# Altium PCB MB1364.PcbDoc (part 1 of 8)
Units mm, origin at the board's own origin, x right, y up, seen from the top; angles counter-clockwise.
Board outline 70 x 133.34 mm, 6 copper layers (Top Layer, Signal Layer 1, Signal Layer 2, Signal Layer 3, Signal Layer 4, Bottom Layer), stack 1.57 mm thick; 320 components, 286 nets, 1370 pads, 2009 vias.
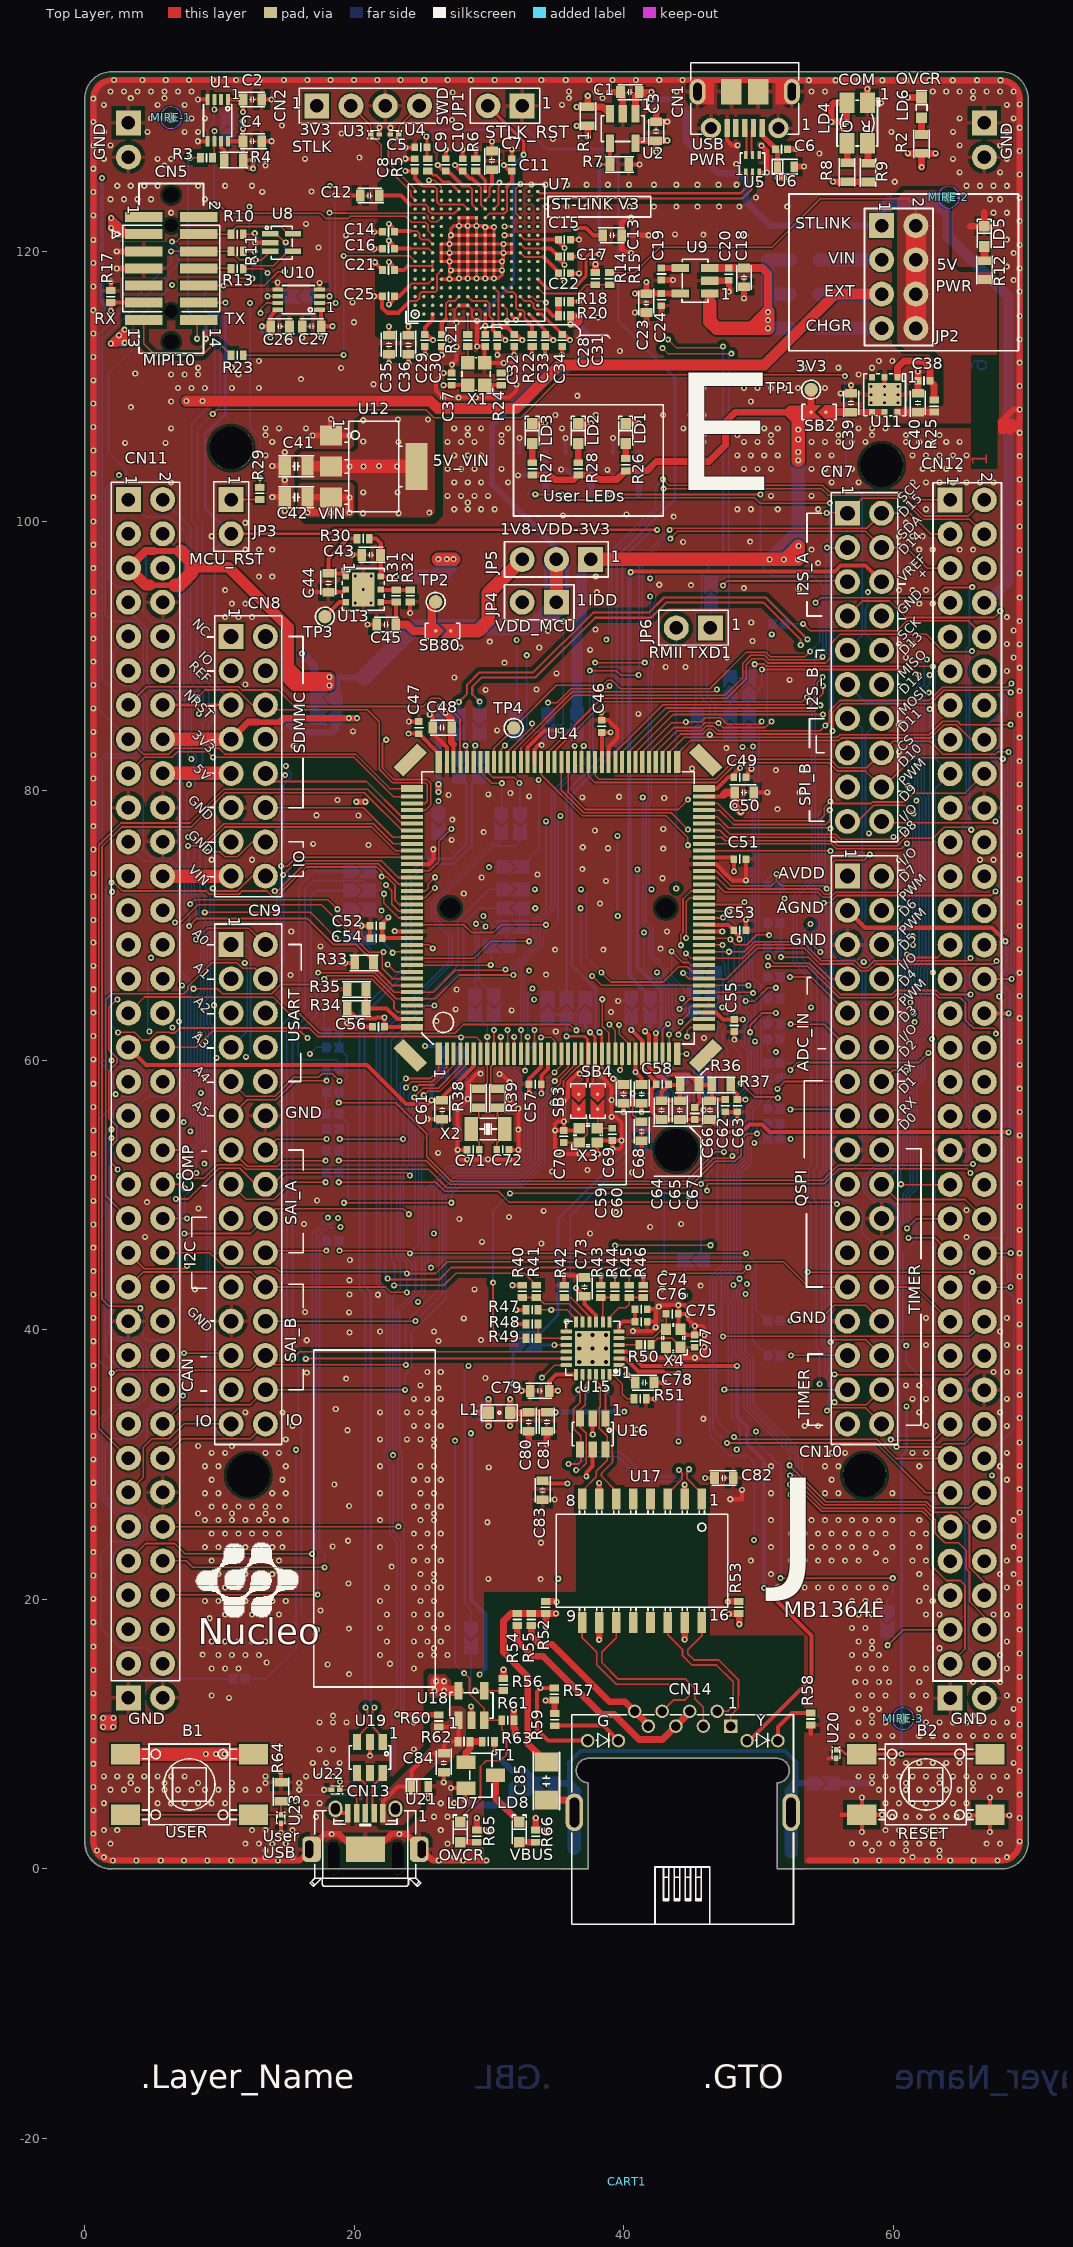
[diagram p0: Top Layer view]
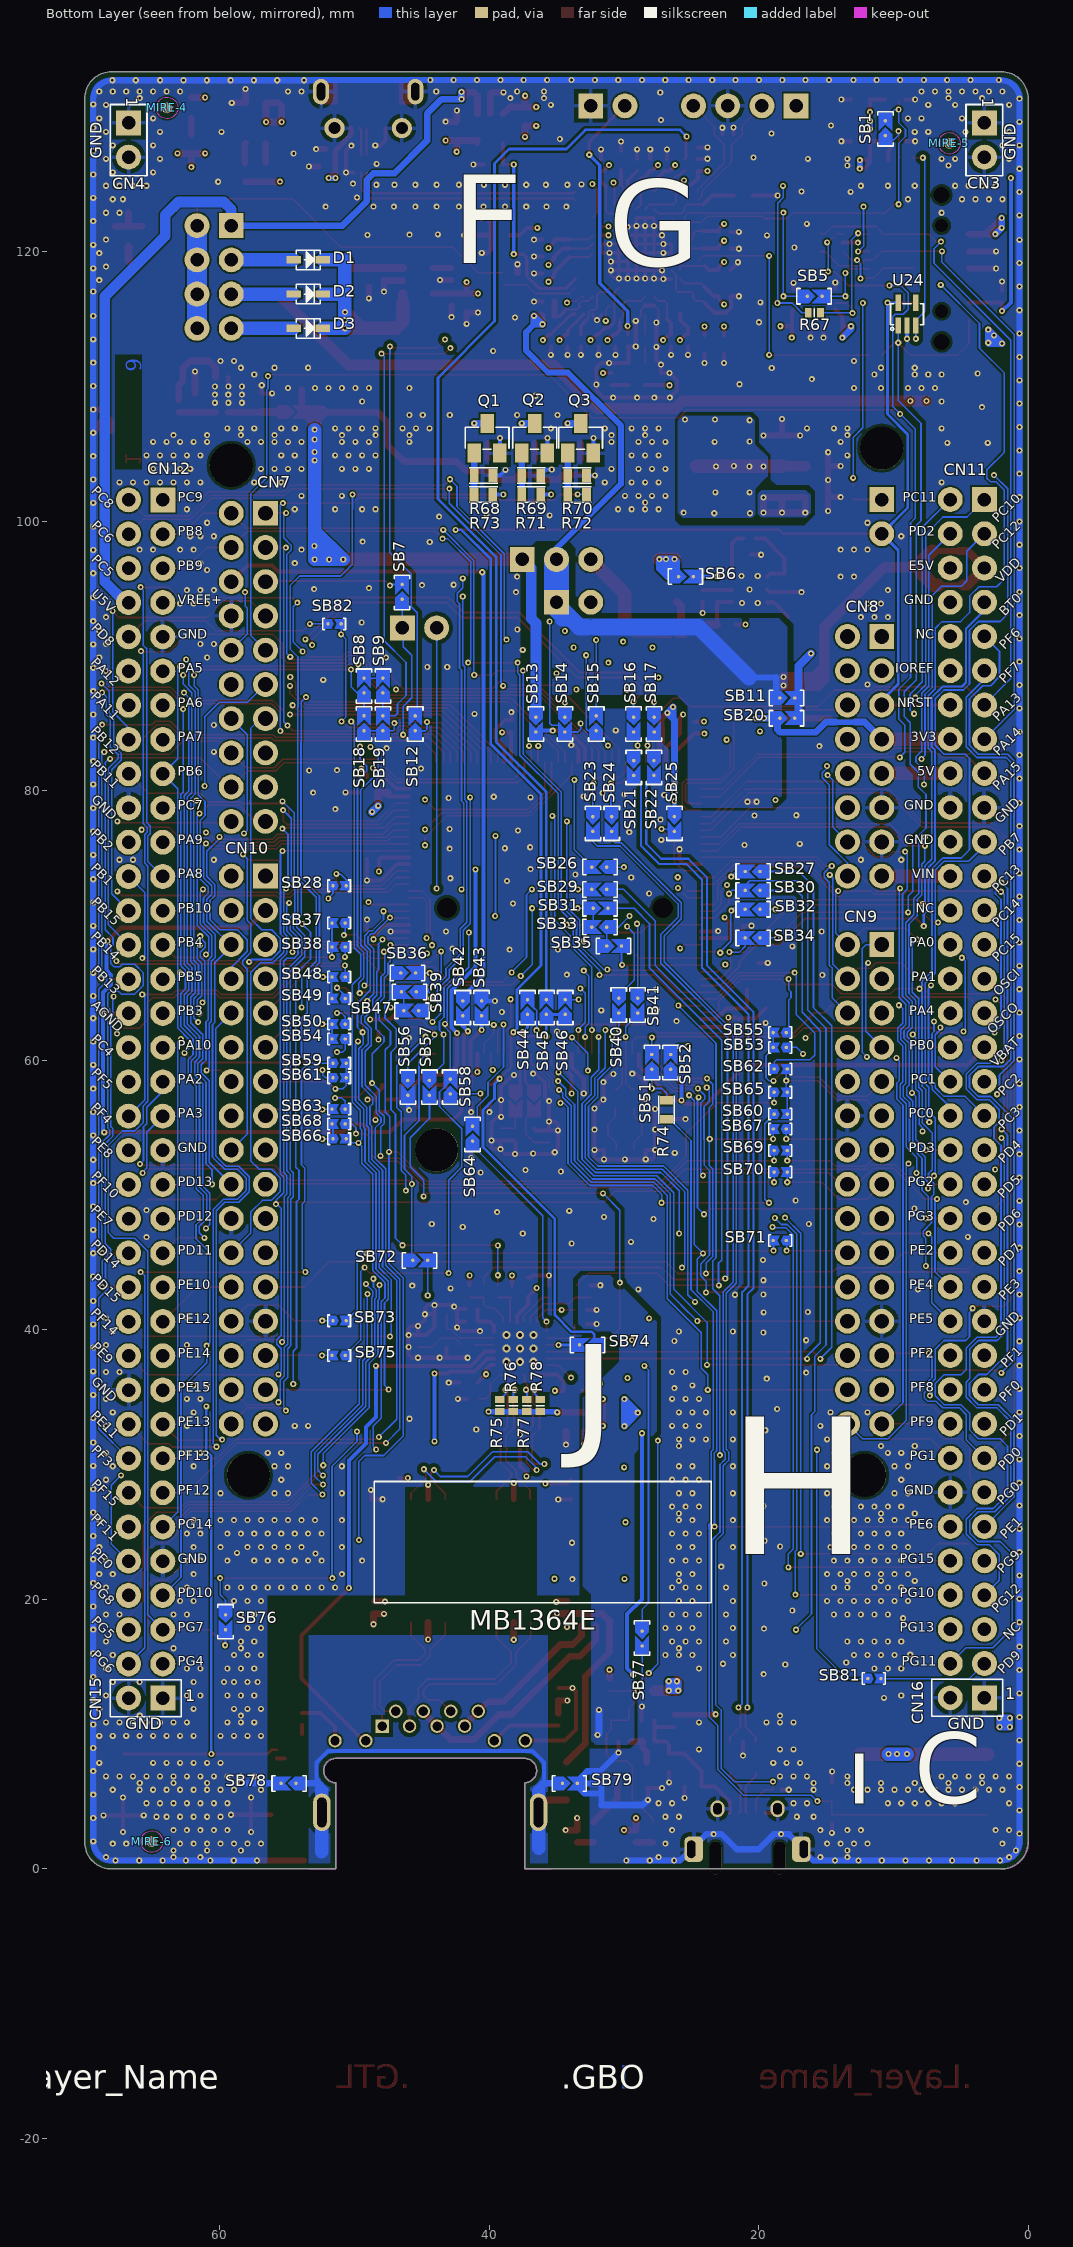
[diagram p1: Bottom Layer view, seen from below]
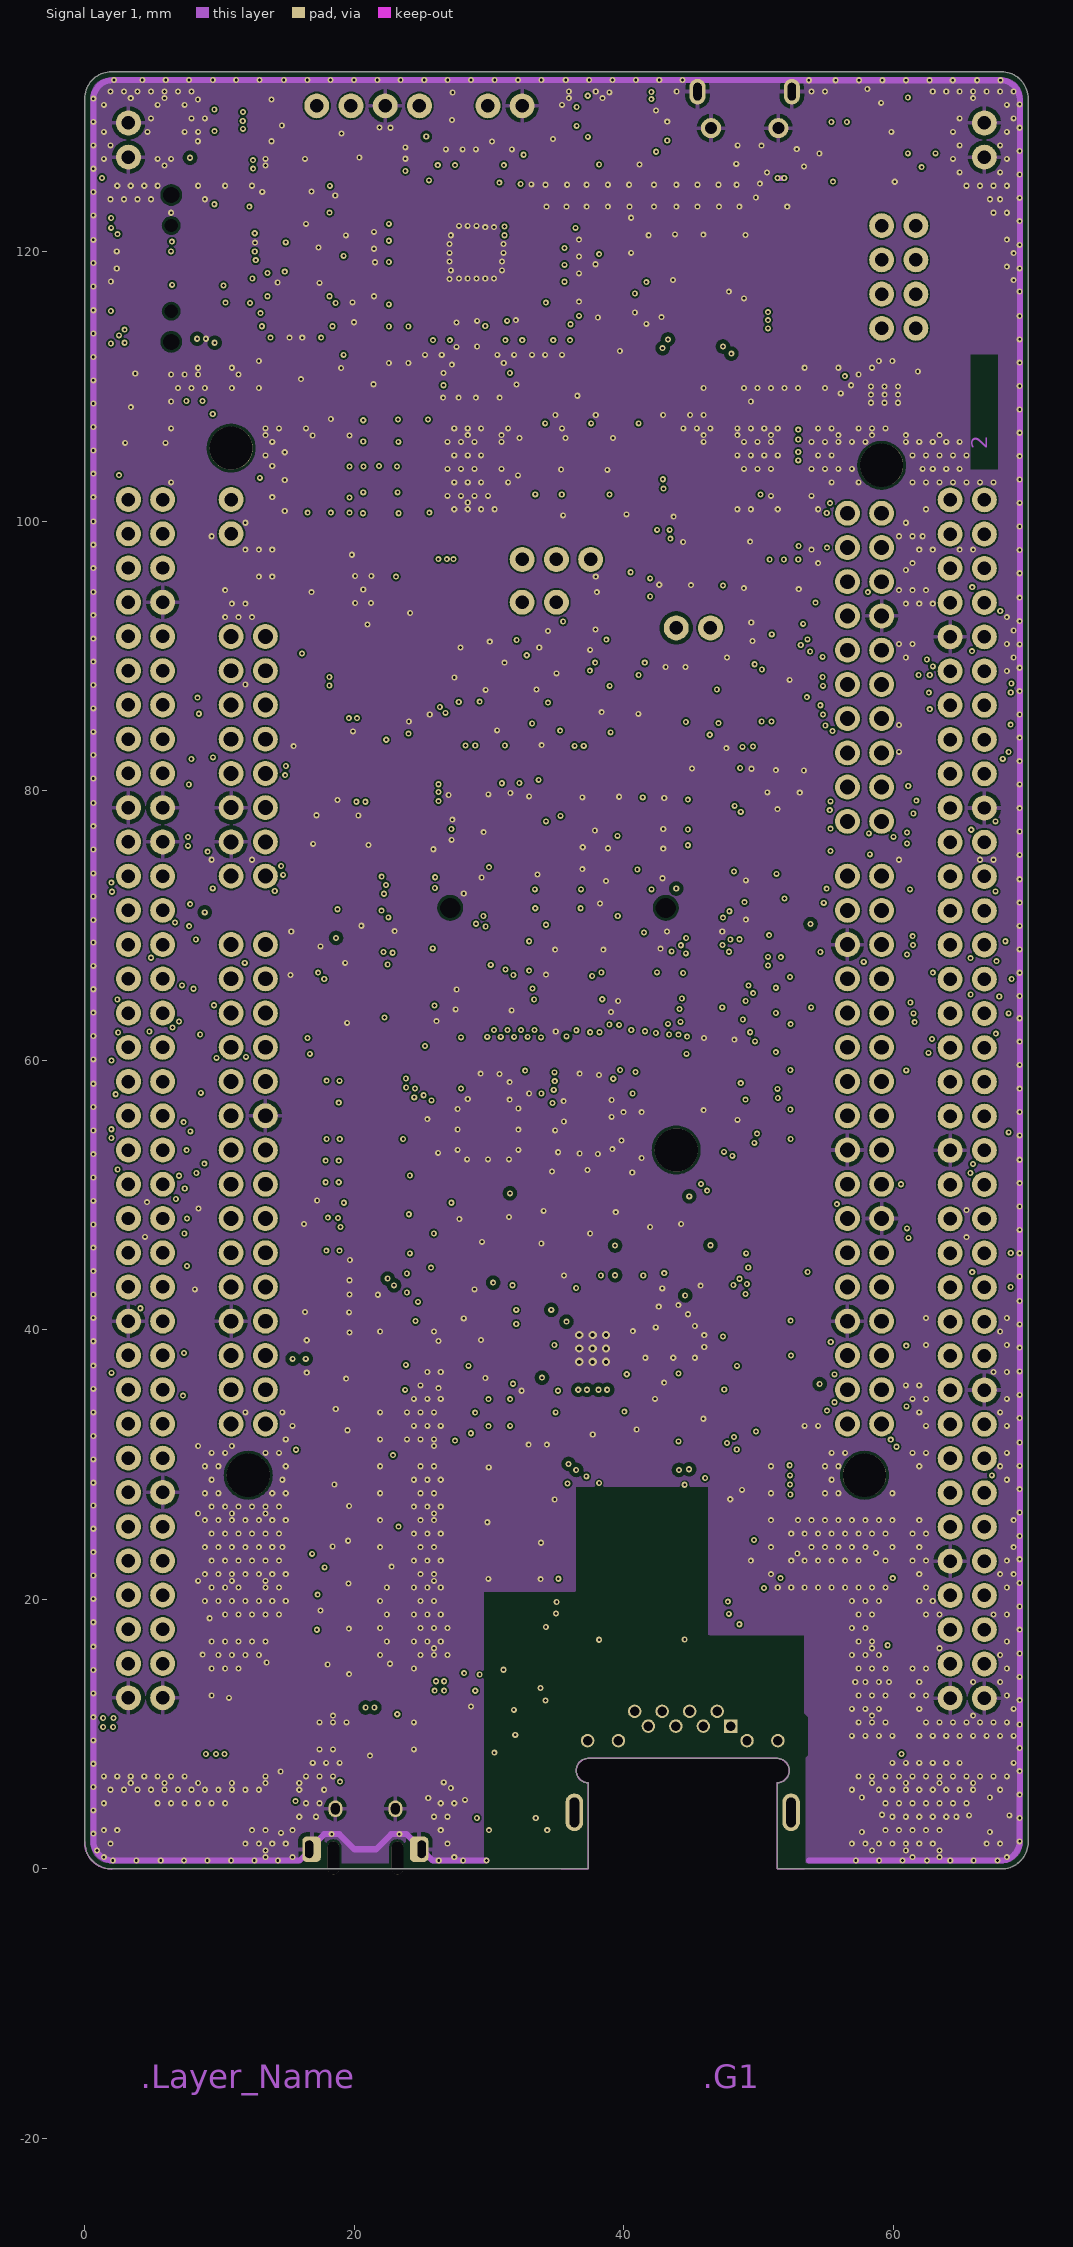
[diagram p2: Signal Layer 1]
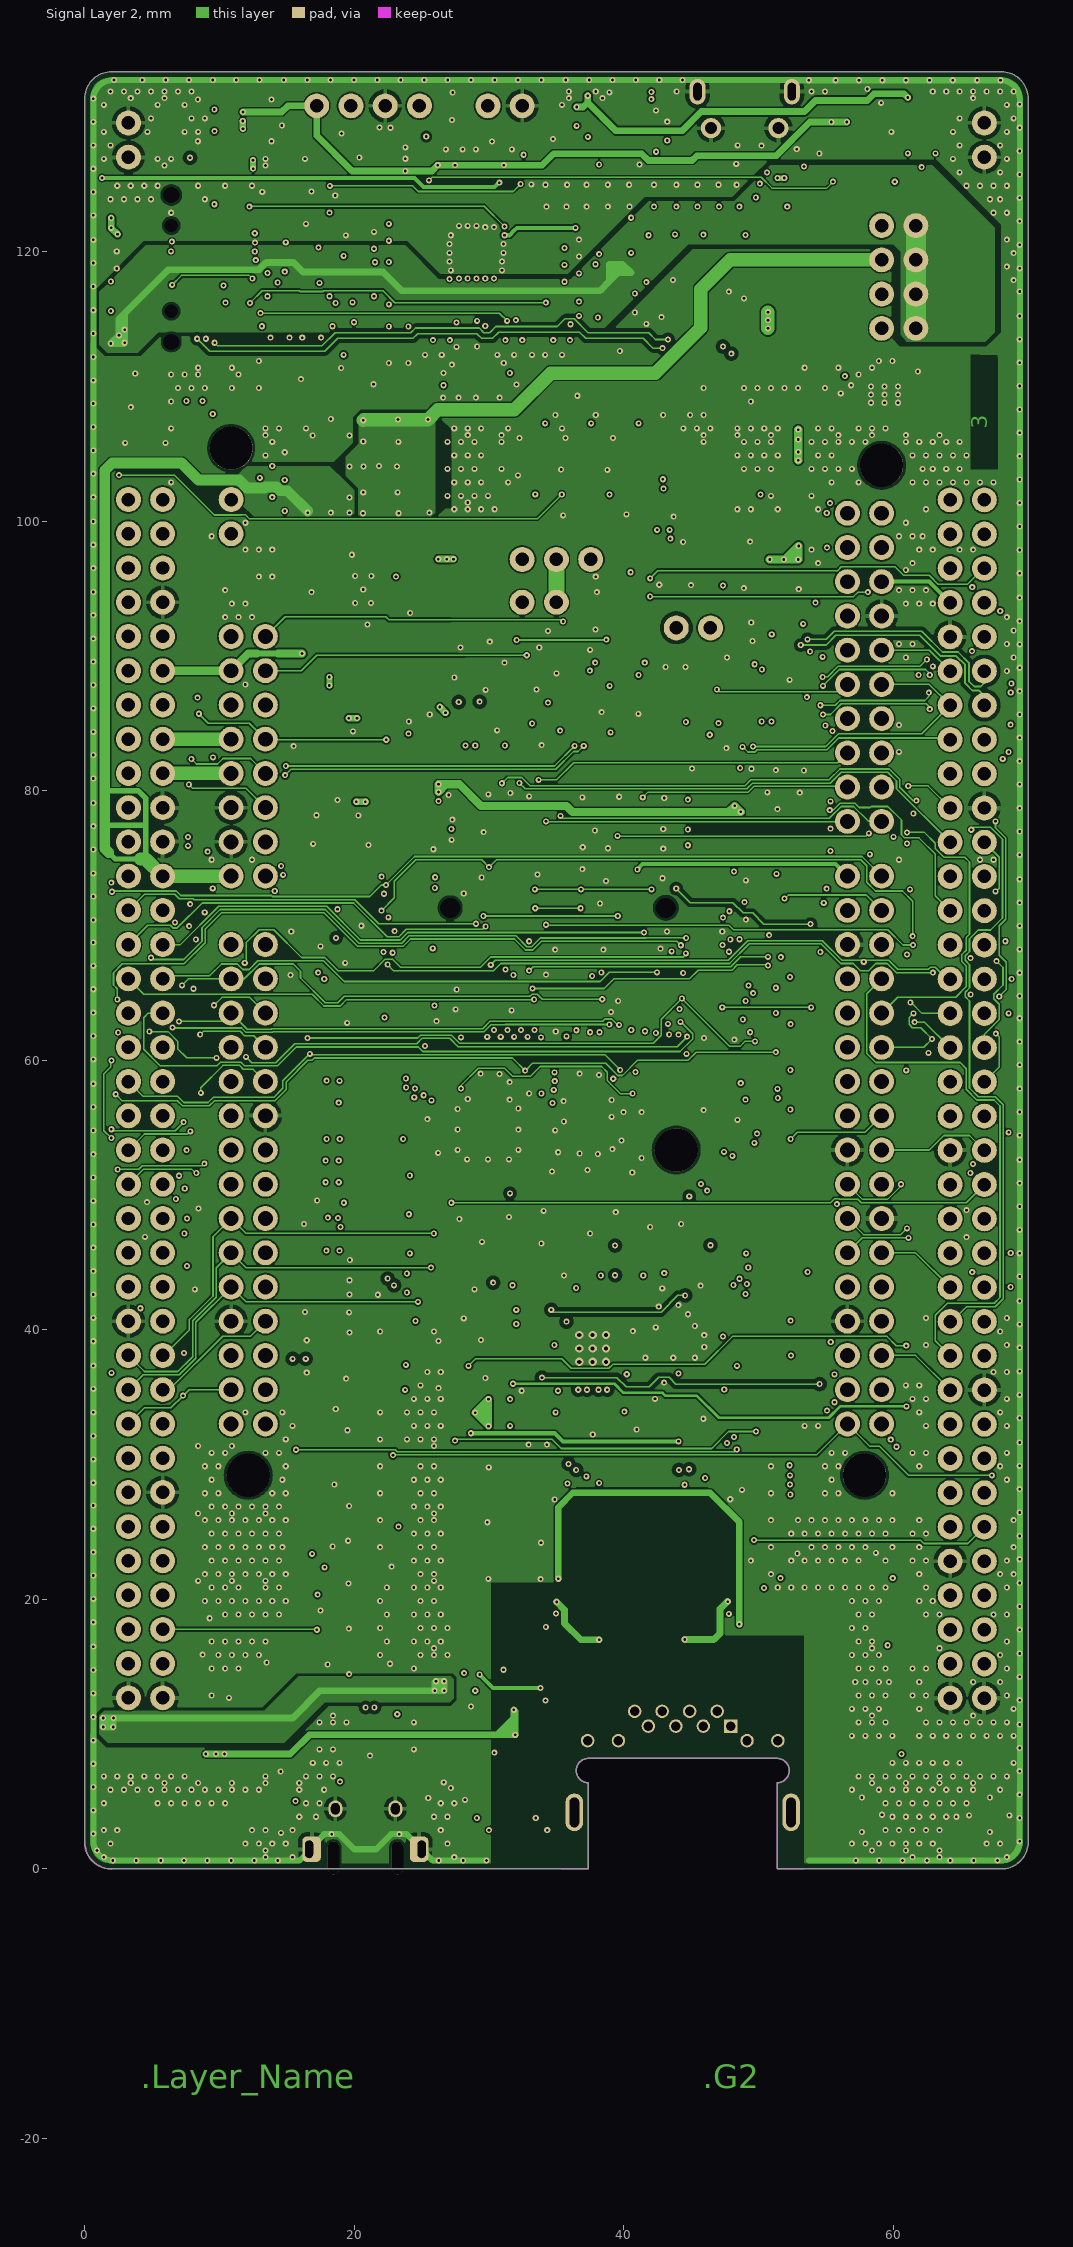
[diagram p3: Signal Layer 2]
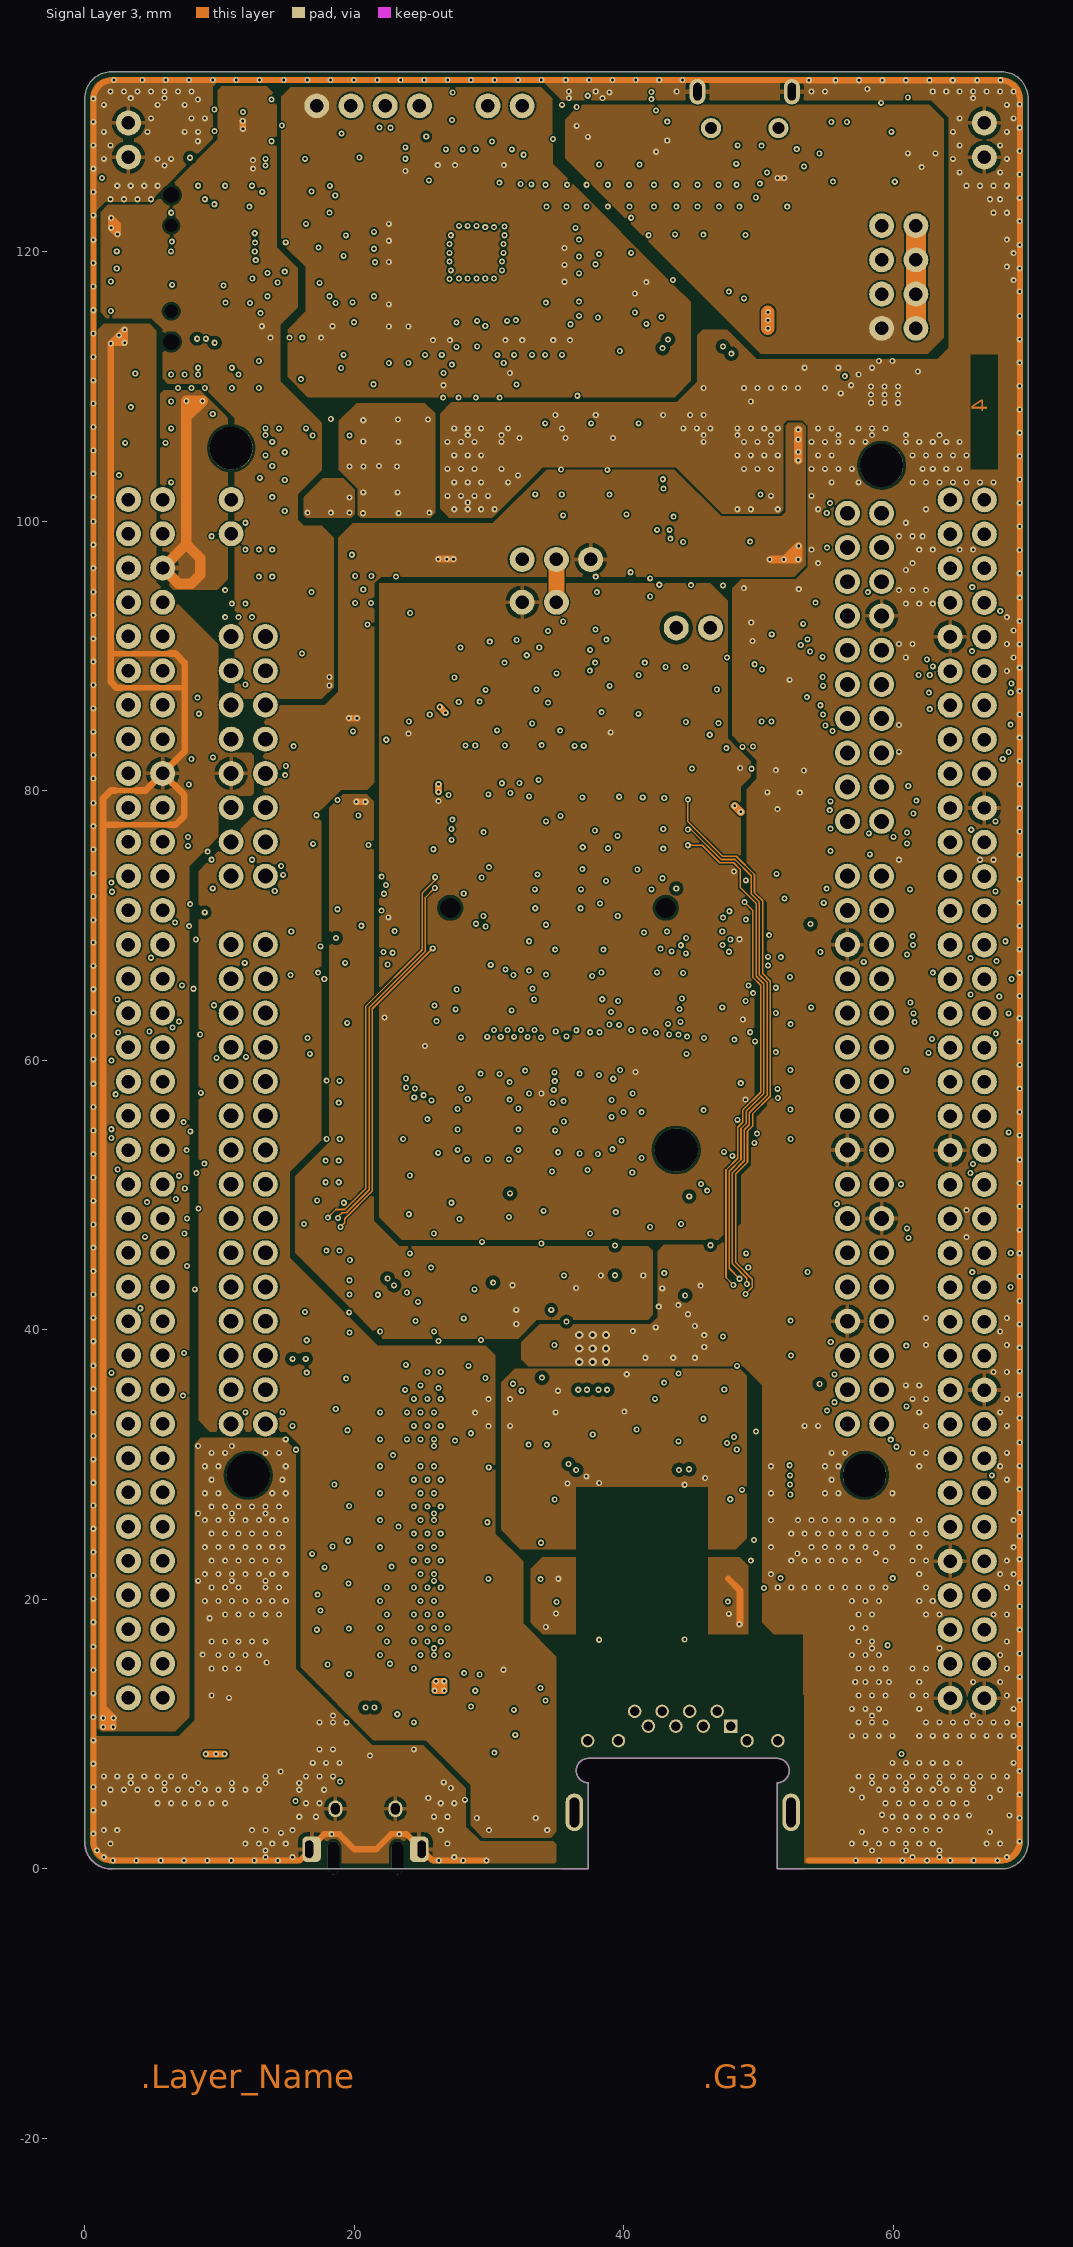
[diagram p4: Signal Layer 3]
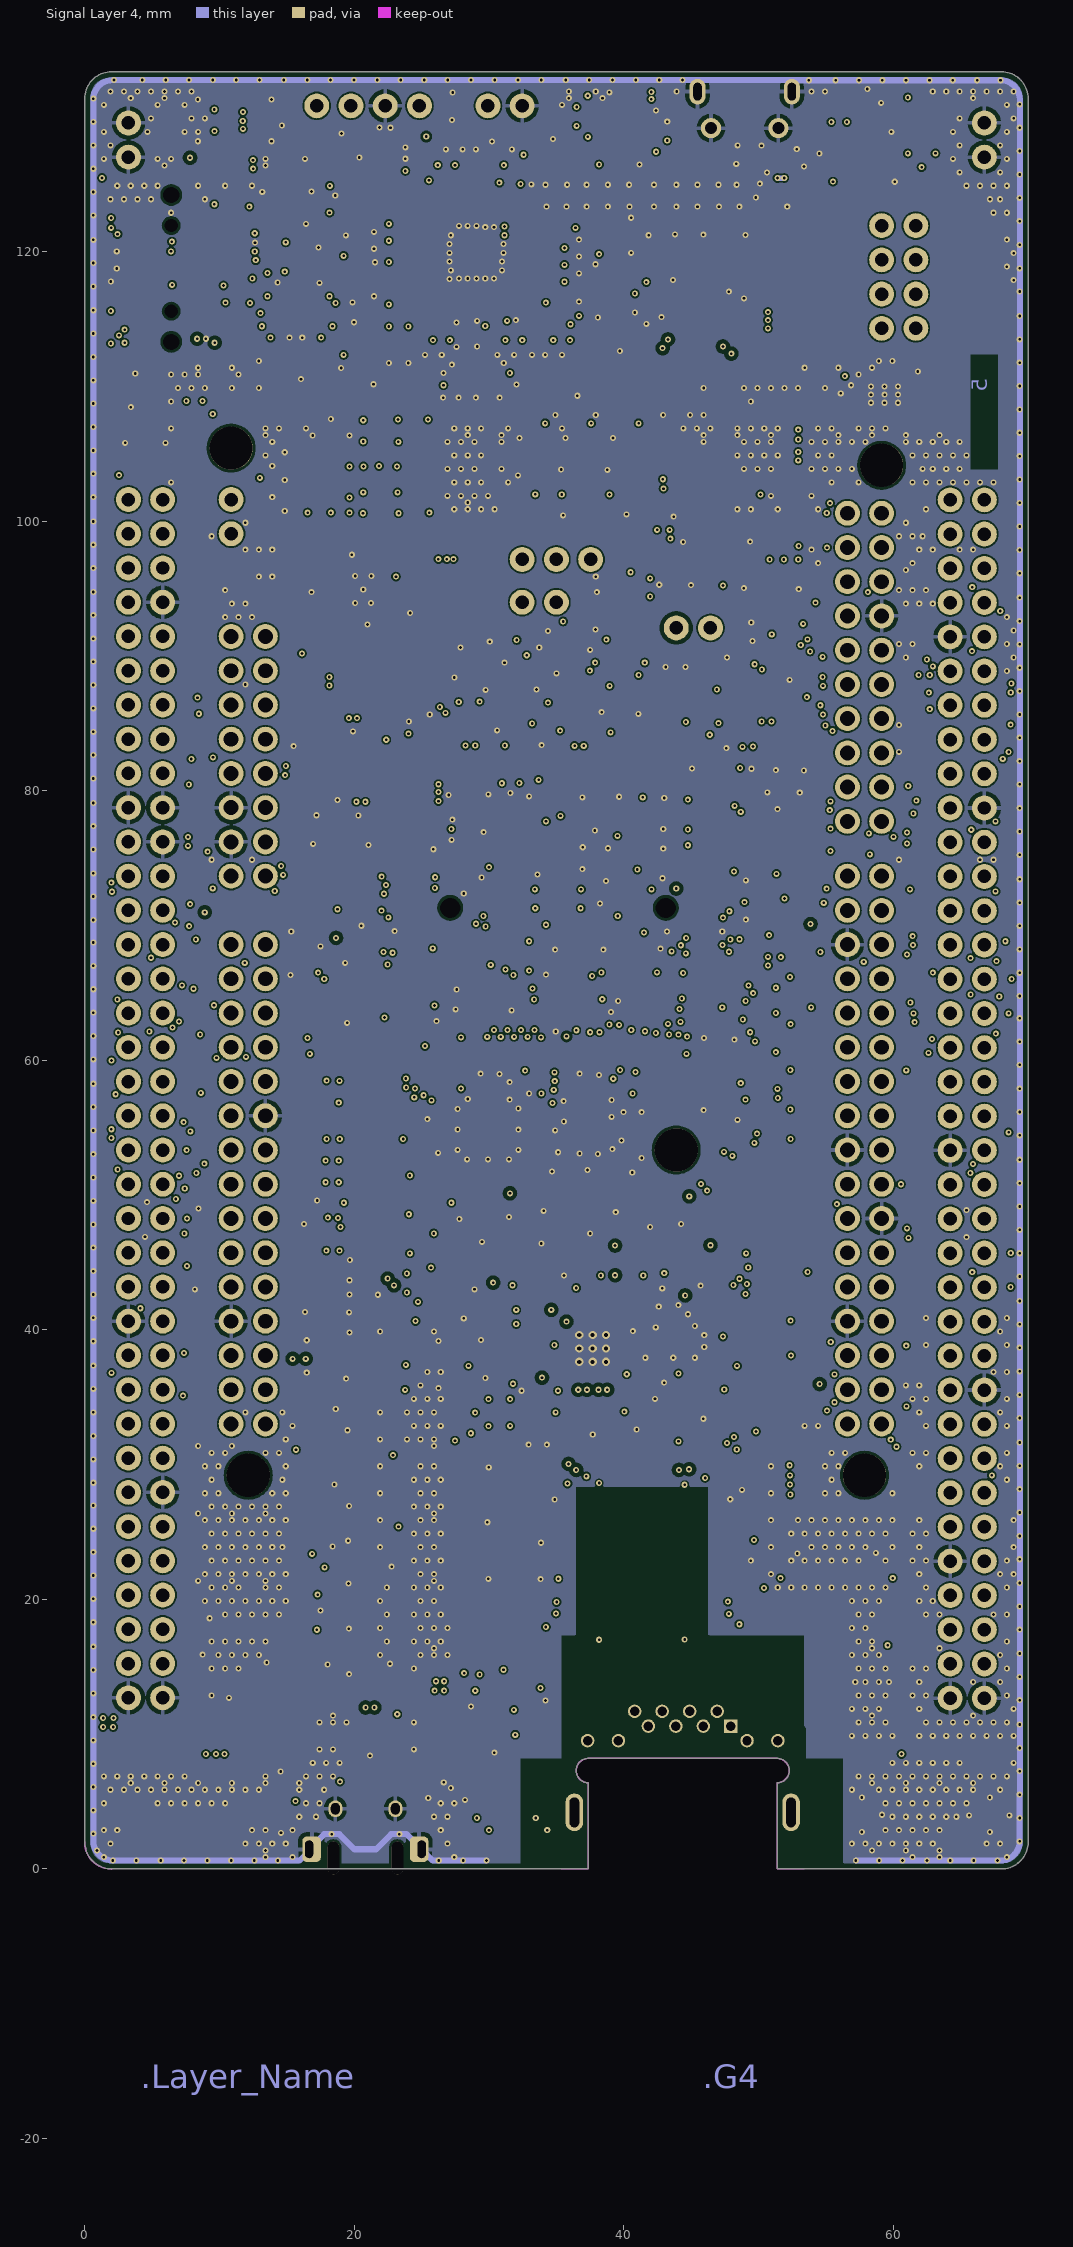
[diagram p5: Signal Layer 4]
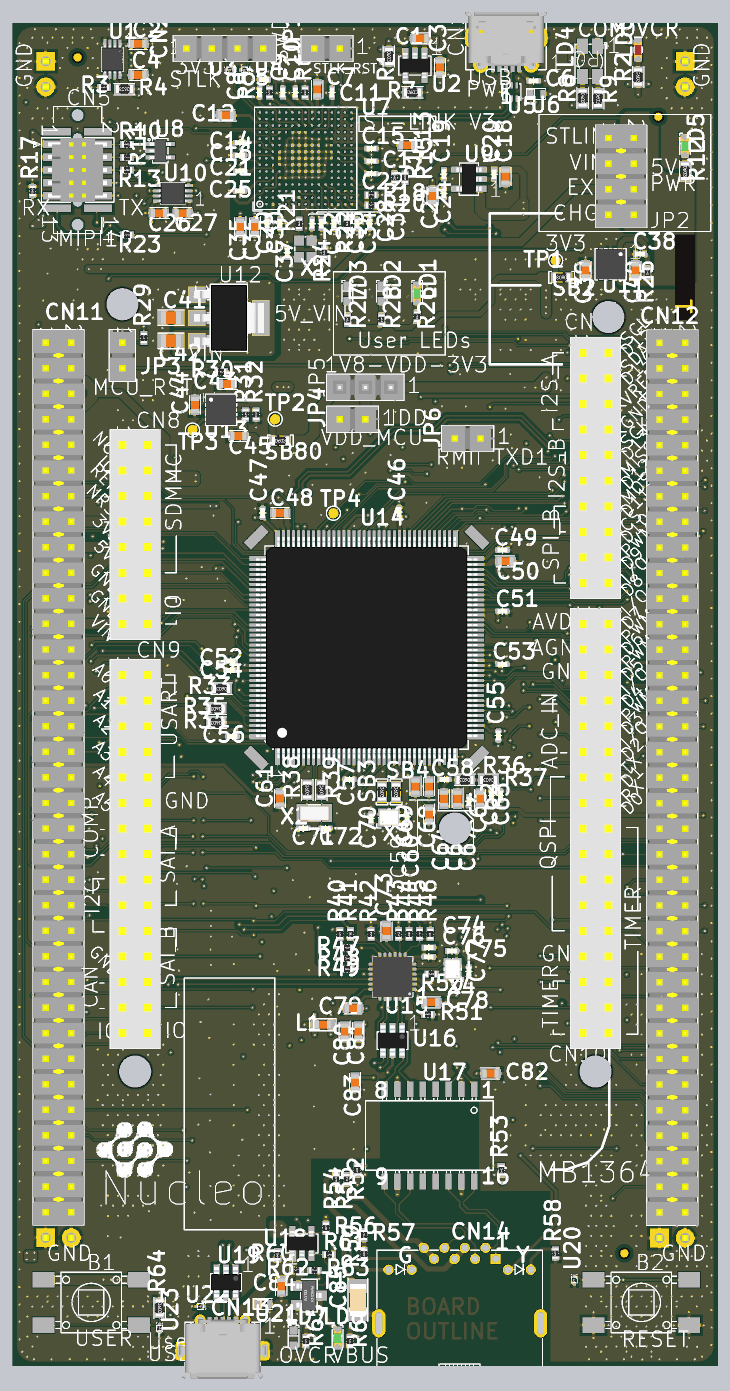
[diagram p12: 3D render of the assembled board from above, using the file's embedded part models]
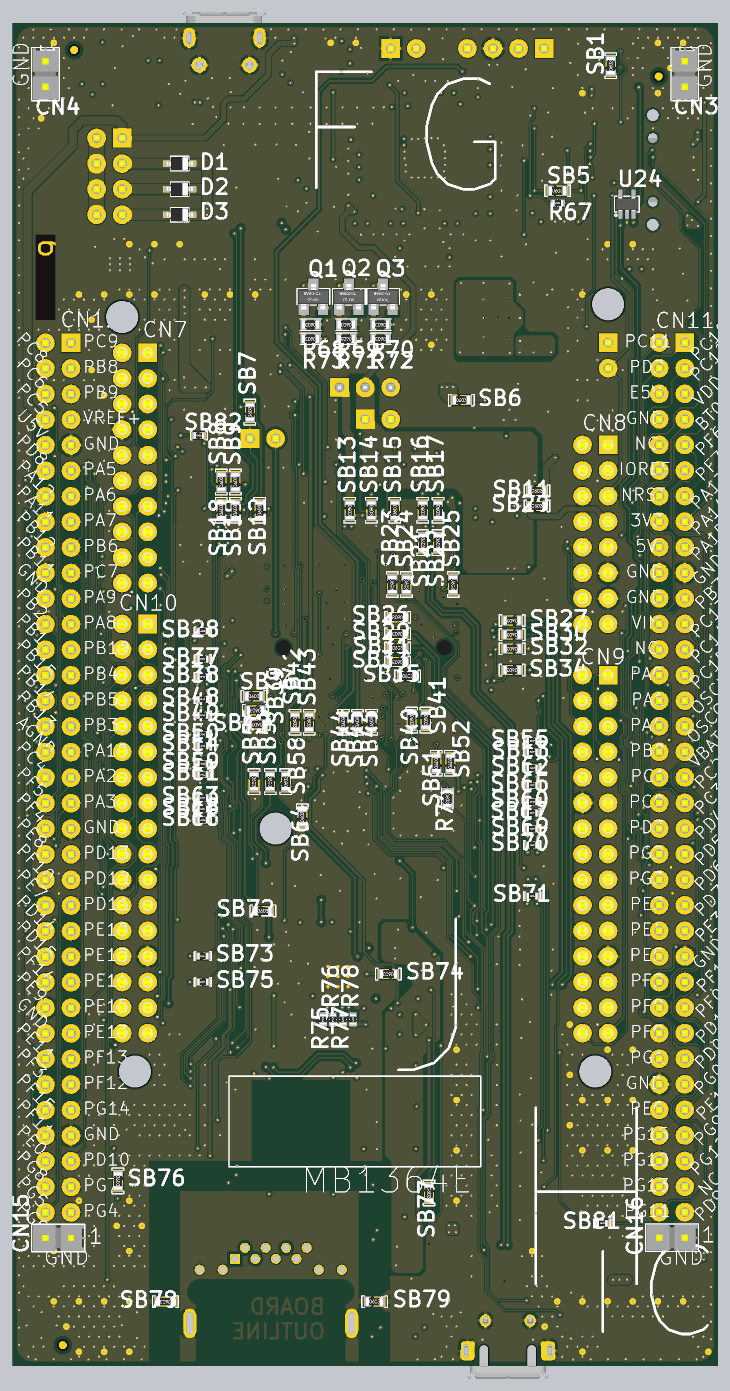
[diagram p13: 3D render of the assembled board from below, using the file's embedded part models]

## Layer stack, top to bottom
Top Solder: solder mask 0.015, Solder Resist, Dk 3.5
Top Layer: signal copper 0.042
Dielectric 1: prepreg 0.0991, FR-4, Dk 4.2
Signal Layer 1: signal copper 0.0348
Dielectric 2: core 0.1016, Dk 4.2
Signal Layer 2: signal copper 0.0348
Dielectric 3: prepreg 0.9457, Dk 4.2
Signal Layer 3: signal copper 0.0348
Dielectric 4: core 0.1016, Dk 4.2
Signal Layer 4: signal copper 0.0348
Dielectric 5: prepreg 0.0991, Dk 4.2
Bottom Layer: signal copper 0.042
Bottom Solder: solder mask 0.015, Solder Resist, Dk 3.5

## Board outline
0,2 ccw(c2,2) 2,0 37.369,0 37.369,6.4 cw(c37.369,7.3) 36.469,7.3 cw(c37.369,7.3) 37.369,8.2 51.369,8.2 cw(c51.369,7.3) 52.269,7.3 cw(c51.369,7.3) 51.369,6.4 51.369,0 68,0 ccw(c68,2) 70,2 70,131.34 ccw(c68,131.34) 68,133.34 2,133.34 ccw(c2,131.34) 0,131.34

## Design rules (kind name [scope] priority, off if disabled: settings)
BoardOutlineClearance [All] p1: gap=0.4 ignorepadtopadclearanceinfootprint=FALSE
Clearance Clearance_RMII_SINGLE_50R [InNetClass('NC_RMII_SINGLE_50R')] p1: gap=0.12 ignorepadtopadclearanceinfootprint=TRUE except(0.2: Arc-Hole Track-Hole SMDPad-SMDPad SMDPad-THPad SMDPad-Hole THPad-THPad THPad-Hole Via-Via Via-Hole Fill-Hole Poly-Hole Region-Hole Text-Hole; 0.3: Arc-Fill Arc-Poly Track-Track Track-Fill Track-Poly SMDPad-Fill SMDPad-Poly THPad-Fill THPad-Poly Via-Fill Via-Poly Fill-Fill Fill-Poly Poly-Poly)
Clearance Clearance_VCP_ISO300 [InNetClass('NC_VCP_ISO300')] p2: gap=0.12 ignorepadtopadclearanceinfootprint=TRUE except(0.2: Arc-Hole Track-Hole SMDPad-SMDPad SMDPad-THPad SMDPad-Hole THPad-THPad THPad-Hole Via-Via Via-Hole Fill-Hole Poly-Hole Region-Hole Text-Hole; 0.3: Arc-Fill Arc-Poly Track-Track Track-Fill Track-Poly SMDPad-Fill SMDPad-Poly THPad-Fill THPad-Poly Via-Fill Via-Poly Fill-Fill Fill-Poly Poly-Poly)
Clearance Clearance_USB_DIFF_90R [InNetClass('NC_USB_DIFF_90R')] p3: gap=0.12 ignorepadtopadclearanceinfootprint=TRUE except(0.2: Arc-Hole Track-Hole SMDPad-SMDPad SMDPad-THPad SMDPad-Hole THPad-THPad THPad-Hole Via-Via Via-Hole Fill-Hole Poly-Hole Region-Hole Text-Hole; 0.3: Arc-Fill Arc-Poly Track-Fill Track-Poly SMDPad-Fill SMDPad-Poly THPad-Fill THPad-Poly Via-Fill Via-Poly Fill-Fill Fill-Poly Poly-Poly)
Clearance Clearance_USB_DIFF_90R_OPTION [InNetClass('NC_USB_DIFF_90R_OPTION') vs OnLayer('Top Layer')] p4: gap=0.12 ignorepadtopadclearanceinfootprint=TRUE except(0.2: Arc-Hole Track-Hole SMDPad-SMDPad SMDPad-THPad SMDPad-Hole THPad-THPad THPad-Hole Via-Via Via-Hole Fill-Hole Poly-Hole Region-Hole Text-Hole; 0.226: Track-Track; 0.3: Arc-Fill Arc-Poly Track-Fill Track-Poly SMDPad-Fill SMDPad-Poly THPad-Fill THPad-Poly Via-Fill Via-Poly Fill-Fill Fill-Poly Poly-Poly)
Clearance Clearance_USB_DIFF_90R_OPTION_L3 [InNetClass('NC_USB_DIFF_90R_OPTION') vs OnLayer('Signal Layer 2')] p5: gap=0.12 ignorepadtopadclearanceinfootprint=TRUE except(0.17: Track-Track; 0.2: Arc-Hole Track-Hole SMDPad-SMDPad SMDPad-THPad SMDPad-Hole THPad-THPad THPad-Hole Via-Via Via-Hole Fill-Hole Poly-Hole Region-Hole Text-Hole; 0.3: Arc-Fill Arc-Poly Track-Fill Track-Poly SMDPad-Fill SMDPad-Poly THPad-Fill THPad-Poly Via-Fill Via-Poly Fill-Fill Fill-Poly Poly-Poly)
Clearance Clearance_RXTX_DIFF_100R [InNetClass('NC_RXTX_DIFF_100R')] p6: gap=0.12 ignorepadtopadclearanceinfootprint=TRUE except(0.2: Arc-Hole Track-Hole SMDPad-SMDPad SMDPad-THPad SMDPad-Hole THPad-THPad THPad-Hole Via-Via Via-Hole Fill-Hole Poly-Hole Region-Hole Text-Hole; 0.3: Arc-Fill Arc-Poly Track-Fill Track-Poly SMDPad-Fill SMDPad-Poly THPad-Fill THPad-Poly Via-Fill Via-Poly Fill-Fill Fill-Poly Poly-Poly)
Clearance Clearance_STLK_ISO200 [InNetClass('NC_STLK_W200-ISO200')] p7: gap=0.12 ignorepadtopadclearanceinfootprint=TRUE except(0.2: Arc-Poly Arc-Hole Track-Track Track-Poly Track-Hole SMDPad-SMDPad SMDPad-THPad SMDPad-Poly SMDPad-Hole THPad-THPad THPad-Poly THPad-Hole Via-Via Via-Poly Via-Hole Fill-Poly Fill-Hole Poly-Poly Poly-Hole Region-Hole Text-Hole; 0.3: Arc-Fill Track-Fill SMDPad-Fill THPad-Fill Via-Fill Fill-Fill)
Clearance [All] p8: gap=0.12 ignorepadtopadclearanceinfootprint=TRUE except(0.2: Arc-Hole Track-Hole SMDPad-SMDPad SMDPad-THPad SMDPad-Hole THPad-THPad THPad-Hole Via-Via Via-Hole Fill-Hole Poly-Hole Region-Hole Text-Hole; 0.3: Arc-Fill Track-Fill SMDPad-Fill THPad-Fill Via-Fill Fill-Fill)
ComponentClearance [All] p1: gap=0 collisioncheckmode=3 verticalgap=0 showdistances=FALSE
DiffPairsRouting DiffPairsRouting_USB_90R [InDifferentialPairClass('DPC_USB_DIFF_90R')] p1: maxlimit=0.252 minlimit=0.226 mostfreqgap=0.226 toplayer_mingap=0.226 toplayer_maxgap=0.226 toplayer_minwidth=0.155 toplayer_maxwidth=0.155 toplayer_prefwidth=0.155 midlayer1_mingap=0.226 midlayer1_maxgap=0.226 midlayer1_minwidth=0.155 midlayer1_maxwidth=0.155 midlayer1_prefwidth=0.155 midlayer2_mingap=0.252 midlayer2_prefgap=0.252 midlayer2_minwidth=0.13 midlayer2_maxwidth=0.13 midlayer2_prefwidth=0.13 midlayer3_maxgap=0.226 midlayer3_prefgap=0.226 midlayer3_minwidth=0.155 midlayer3_maxwidth=0.155 midlayer3_prefwidth=0.155 midlayer4_mingap=0.226 midlayer4_maxgap=0.226 midlayer4_minwidth=0.155 midlayer4_maxwidth=0.155 midlayer4_prefwidth=0.155 bottomlayer_mingap=0.226 bottomlayer_maxgap=0.226 bottomlayer_minwidth=0.155 bottomlayer_maxwidth=0.155 bottomlayer_prefwidth=0.155 maxuncoupledlength=12.7
DiffPairsRouting DiffPairsRouting_RXTX_100R [InDifferentialPairClass('DPC_RXTX_DIFF_100R')] p2: maxlimit=0.277 minlimit=0.252 mostfreqgap=0.277 toplayer_maxgap=0.252 toplayer_prefgap=0.252 toplayer_minwidth=0.11 toplayer_maxwidth=0.13 toplayer_prefwidth=0.13 midlayer1_maxgap=0.252 midlayer1_prefgap=0.252 midlayer1_minwidth=0.13 midlayer1_maxwidth=0.13 midlayer1_prefwidth=0.13 midlayer2_mingap=0.277 midlayer2_minwidth=0.104 midlayer2_maxwidth=0.104 midlayer2_prefwidth=0.104 midlayer3_maxgap=0.252 midlayer3_prefgap=0.252 midlayer3_minwidth=0.13 midlayer3_maxwidth=0.13 midlayer3_prefwidth=0.13 midlayer4_maxgap=0.252 midlayer4_prefgap=0.252 midlayer4_minwidth=0.13 midlayer4_maxwidth=0.13 midlayer4_prefwidth=0.13 bottomlayer_maxgap=0.252 bottomlayer_prefgap=0.252 bottomlayer_minwidth=0.11 bottomlayer_maxwidth=0.13 bottomlayer_prefwidth=0.13 maxuncoupledlength=12.7
FabricationTestPointUsage TestPointUsage [All] p1: valid=0 allowmultiple=FALSE
FabricationTestpoint Testpoint [(IsPad And (OnTopLayer Or OnBottomLayer))] p1: side=3 testpointundercomponent=TRUE minsize=1.016 maxsize=2.54 preferedsize=1.524 minholesize=0 maxholesize=1.016 preferedholesize=0.813 testpointgrid=0.025 allowsidetop=TRUE allowsidebottom=TRUE usegrid=TRUE gridtolerance=0
HoleSize [All] p1: absolutevalues=TRUE maxlimit=3.81 minlimit=0.025 maxpercent=80.000 minpercent=20.000
MaxMinImpedance "Schematic Impedance Constraint_3" [InNet('USB_DEV_HS_P')] p1: minimum=85,00 maximum=95,00
MaxMinImpedance "Schematic Impedance Constraint_2" [InNet('USB_DEV_HS_N')] p2: minimum=85,00 maximum=95,00
MaxMinImpedance "Schematic Impedance Constraint_1" [InNet('USB_DEV_HS_CN_P')] p3: minimum=85,00 maximum=95,00
MaxMinImpedance "Schematic Impedance Constraint" [InNet('USB_DEV_HS_CN_N')] p4: minimum=85,00 maximum=95,00
MinimumSolderMaskSliver [All] p1: minsoldermaskwidth=0
PolygonConnect PolygonConnect_10 [All vs IsNamedPolygon('USB_FS_VBUS_L01_P068')] p1: connectstyle=Direct reliefconductorwidth=0.254 reliefentries=4 polygonreliefangle="90 Angle" airgapwidth=0.254
PolygonConnect PolygonConnect_9 [All vs IsNamedPolygon('5V_L03_P060')] p2: connectstyle=Direct reliefconductorwidth=0.254 reliefentries=4 polygonreliefangle="90 Angle" airgapwidth=0.254
PolygonConnect PolygonConnect_8 [All vs IsNamedPolygon('5V_L01_P058')] p3: connectstyle=Direct reliefconductorwidth=0.254 reliefentries=4 polygonreliefangle="90 Angle" airgapwidth=0.254
PolygonConnect PolygonConnect_7 [All vs IsNamedPolygon('3V3_STLK_L04_P042')] p4: connectstyle=Direct reliefconductorwidth=0.254 reliefentries=4 polygonreliefangle="90 Angle" airgapwidth=0.254
PolygonConnect PolygonConnect_6 [All vs IsNamedPolygon('5V_USB_CHGR_L04_P040')] p5: connectstyle=Direct reliefconductorwidth=0.254 reliefentries=4 polygonreliefangle="90 Angle" airgapwidth=0.254
PolygonConnect PolygonConnect_5 [All vs IsNamedPolygon('5V_L01_P038')] p6: connectstyle=Direct reliefconductorwidth=0.254 reliefentries=4 polygonreliefangle="90 Angle" airgapwidth=0.254
PolygonConnect PolygonConnect_4 [All vs IsNamedPolygon('5V_L01_P038')] p7: thpad.connectstyle=Relief thpad.reliefconductorwidth=0.4 thpad.reliefentries=4 thpad.polygonreliefangle="90 Angle" thpad.airgapwidth=0.4 smdpad.connectstyle=Direct smdpad.reliefconductorwidth=0.254 smdpad.reliefentries=4 smdpad.polygonreliefangle="90 Angle" smdpad.airgapwidth=0.254 via.connectstyle=Direct via.reliefconductorwidth=0.254 via.reliefentries=4 via.polygonreliefangle="90 Angle" via.airgapwidth=0.254
PolygonConnect PolygonConnect_3 [All vs IsNamedPolygon('5V_VIN_L01_P028')] p8: connectstyle=Direct reliefconductorwidth=0.254 reliefentries=4 polygonreliefangle="90 Angle" airgapwidth=0.254
PolygonConnect PolygonConnect_2 [All vs IsNamedPolygon('VIN_L01_P026')] p9: connectstyle=Direct reliefconductorwidth=0.254 reliefentries=4 polygonreliefangle="90 Angle" airgapwidth=0.254
PolygonConnect PolygonConnect_1 [All vs IsNamedPolygon('GND_L01_P024')] p10: connectstyle=Direct reliefconductorwidth=0.254 reliefentries=4 polygonreliefangle="90 Angle" airgapwidth=0.254
PolygonConnect [All] p11: thpad.connectstyle=Relief thpad.reliefconductorwidth=0.3 thpad.reliefentries=4 thpad.polygonreliefangle="90 Angle" thpad.airgapwidth=0.3 smdpad.connectstyle=Relief smdpad.reliefconductorwidth=0.3 smdpad.reliefentries=4 smdpad.polygonreliefangle="90 Angle" smdpad.airgapwidth=0.3 via.connectstyle=Direct via.reliefconductorwidth=0.254 via.reliefentries=4 via.polygonreliefangle="90 Angle" via.airgapwidth=0.254
RoutingLayers RoutingLayers_USB_DIFF_90R [InDifferentialPairClass('DPC_USB_DIFF_90R')] p1: top layer_v5=TRUE mid layer 1_v5=TRUE mid layer 2_v5=TRUE mid layer 3_v5=TRUE mid layer 4_v5=TRUE bottom layer_v5=TRUE
RoutingLayers RoutingLayers_RXTX_DIFF_100R [InDifferentialPairClass('DPC_RXTX_DIFF_100R')] p2: top layer_v5=TRUE mid layer 1_v5=TRUE mid layer 2_v5=TRUE mid layer 3_v5=TRUE mid layer 4_v5=TRUE bottom layer_v5=TRUE
RoutingLayers RoutingLayers_RMII_SINGLE_50R [InNetClass('NC_RMII_SINGLE_50R')] p3: top layer_v5=TRUE mid layer 1_v5=TRUE mid layer 2_v5=TRUE mid layer 3_v5=TRUE mid layer 4_v5=TRUE bottom layer_v5=TRUE
RoutingVias RoutingVias_Default [All] p1: holewidth=0.2 width=0.45 viastyle="Through Hole" minholewidth=0.2 minwidth=0.45 maxholewidth=0.2 maxwidth=0.45
SilkToSilkClearance [All] p1: silktosilkclearance=0.102
SilkToSolderMaskClearance SilkscreenOverComponentPads [IsPad] p1: minsilkscreentomaskgap=0.102 clearancetoexposedcopper=TRUE
SolderMaskExpansion [All] p1: expansion=0.102
Width Width_RMII_SINGLE_50R [InNetClass('NC_RMII_SINGLE_50R')] p1: maxlimit=0.127 minlimit=0.102 preferedwidth=0.127 toplayer_minwidth=0.127 midlayer1_minwidth=0.127 midlayer2_maxwidth=0.102 midlayer2_prefwidth=0.102 midlayer3_minwidth=0.127 midlayer4_minwidth=0.127 bottomlayer_minwidth=0.127 minimp=50.000000 maximp=50.000000 favimp=50.000000
Width Width_POWER_300u [InNetClass('NC_POWER_300u')] p2: maxlimit=10 minlimit=0.12 preferedwidth=0.3 minimp=50.000000 maximp=50.000000 favimp=50.000000
Width Width_GROUND [InNetClass('NC_GROUND')] p3: maxlimit=10 minlimit=0.12 preferedwidth=0.3 minimp=50.000000 maximp=50.000000 favimp=50.000000
Width Width_POWER_500u [InNetClass('NC_POWER_500u')] p4: maxlimit=10 minlimit=0.12 preferedwidth=0.5 minimp=50.000000 maximp=50.000000 favimp=50.000000
Width Width_POWER_SMPS [InNetClass('NC_POWER_SMPS')] p5: maxlimit=10 minlimit=0.12 preferedwidth=0.5 minimp=50.000000 maximp=50.000000 favimp=50.000000
Width Width_STLK_W200 [InNetClass('NC_STLK_W200-ISO200')] p6: maxlimit=10 minlimit=0.2 preferedwidth=0.2 minimp=50.000000 maximp=50.000000 favimp=50.000000
Width Width_USB_OPTION [InNetClass('NC_USB_DIFF_90R_OPTION')] p7: maxlimit=0.155 minlimit=0.13 preferedwidth=0.155 toplayer_minwidth=0.155 midlayer1_minwidth=0.155 midlayer2_maxwidth=0.13 midlayer2_prefwidth=0.13 midlayer3_minwidth=0.155 midlayer4_minwidth=0.155 bottomlayer_minwidth=0.155 minimp=50.000000 maximp=50.000000 favimp=50.000000
Width Width_RD_N [InNet('RD_N')] p8: maxlimit=10 minlimit=0.11 preferedwidth=0.12 toplayer_maxwidth=0.11 toplayer_prefwidth=0.11 midlayer1_minwidth=0.12 midlayer2_minwidth=0.12 midlayer3_minwidth=0.12 midlayer4_minwidth=0.12 bottomlayer_maxwidth=0.11 bottomlayer_prefwidth=0.11 minimp=50.000000 maximp=50.000000 favimp=50.000000
Width Width_TD_P [InNet('TD_P')] p9: maxlimit=10 minlimit=0.11 preferedwidth=0.12 toplayer_maxwidth=0.11 toplayer_prefwidth=0.11 midlayer1_minwidth=0.12 midlayer2_minwidth=0.12 midlayer3_minwidth=0.12 midlayer4_minwidth=0.12 bottomlayer_maxwidth=0.11 bottomlayer_prefwidth=0.11 minimp=50.000000 maximp=50.000000 favimp=50.000000
Width [All] p10: maxlimit=10 minlimit=0.12 preferedwidth=0.12 minimp=50.000000 maximp=50.000000 favimp=50.000000
21 further rules are at their usual default settings.

## Classes and differential pairs
net class NC_POWER_500u: 1V8 3V3 3V3_STLK 5V 5V_EXT 5V_USB_CHGR 5V_USB_STLK 5V_VIN IOREF USB_FS_VBUS VDD VIN
net class NC_POWER_SMPS: VCAP VDD_MCU
net class NC_POWER_300u: VBAT VDDA VREFP
net class NC_GROUND: AGND GND
net class NC_RXTX_DIFF_100R: RD_N RD_P RX_N RX_P TD_N TD_P TX_N TX_P
differential pair class DPC_USB_DIFF_90R: USB_DEV_HS USB_DEV_HS_CN USB_FS USB_FS_CN
differential pair class DPC_RXTX_DIFF_100R: RD RX TD TX
net class NC_USB_DIFF_90R: NetCN13_2 NetCN13_3 USB_DEV_HS_CN_N USB_DEV_HS_CN_P USB_DEV_HS_N USB_DEV_HS_P USB_FS_N USB_FS_P
net class NC_RMII_SINGLE_50R: RMII_CRS_DV RMII_MDC RMII_MDIO RMII_REF_CLK RMII_RXD0 RMII_RXD1 RMII_TX_EN RMII_TXD0 RMII_TXD1
net class NC_VCP_ISO300: T_VCP_RX T_VCP_TX
net class NC_STLK_W200-ISO200: NetR5_1 PH0-OSC_IN STLK_MCO
net class NC_USB_DIFF_90R_OPTION: NetCN12_12 NetCN12_14
differential pair USB_FS: +USB_FS_P -USB_FS_N
differential pair USB_DEV_HS: +USB_DEV_HS_P -USB_DEV_HS_N
differential pair USB_DEV_HS_CN: +USB_DEV_HS_CN_P -USB_DEV_HS_CN_N
differential pair TX: +TX_P -TX_N
differential pair TD: +TD_P -TD_N
differential pair RX: +RX_P -RX_N
differential pair RD: +RD_P -RD_N
differential pair USB_FS_CN: +NetCN13_3 -NetCN13_2

## Components (designator, comment, footprint, x,y, rotation, side; value= is the part's Value field where it differs from the comment)
B1 "SW-PUSH-CMS" SWI_WEALTHMETAL_TD-0341_4P_BLUE 7.767,6.273 r270 top locked value=SWITCH
B2 "SW-PUSH-CMS" SWI_WEALTHMETAL_TD-0341_4P_BLACK 62.403,6.273 r270 top locked value=SWITCH
C1 "Capacitor" C0603 40.448,131.82 r0 top value=1uF
C2 "Capacitor" C0603 12.441,131.279 r180 top value=100nF
C3 "Capacitor" C0603 42.396,128.927 r270 top value=1uF
C4 "Capacitor" C0603 12.441,128.179 r0 top value=100nF
C5 "Capacitor" C0402 24.941,127.729 r0 top value=20pF
C6 "Capacitor" C0402 51.699,127.593 r180 top value=100pF
C7 "Capacitor" C0603 30.216,126.754 r270 top value=2.2uF
C8 "Capacitor" C0402 24.491,126.429 r270 top value=100nF
C9 "Capacitor" C0402 26.791,126.429 r270 top value=100nF
C10 "Capacitor" C0402 28.041,126.429 r270 top value=100nF
C11 "Capacitor" C0402 31.691,126.429 r270 top value=100nF
C12 "Capacitor" C0603 21.141,124.154 r0 top value=2.2uF
C13 "Capacitor" C0603 39.141,121.204 r180 top value=2.2uF
C14 "Capacitor" C0402 22.541,121.454 r0 top value=100nF
C15 "Capacitor" C0402 35.591,120.879 r180 top value=100nF
C16 "Capacitor" C0402 22.541,120.204 r0 top value=100nF
C17 "Capacitor" C0402 35.591,119.629 r180 top value=100nF
C18 "Capacitor" C0603 48.916,118.079 r270 top value=1uF
C19 "Capacitor" C0402 42.791,118.329 r90 top value=10nF
C20 "Capacitor" C0402 47.794,118.32 r90 top value=100nF
C21 "Capacitor" C0402 22.541,118.629 r0 top value=100nF
C22 "Capacitor" C0402 35.591,118.379 r180 top value=100nF
C23 "Capacitor" C0603 41.666,116.179 r90 top value=1uF
C24 "Capacitor" C0402 42.791,116.429 r90 top value=100nF
C25 "Capacitor" C0402 22.541,116.679 r0 top value=100nF
C26 "Capacitor" C0603 14.491,114.454 r0 top value=100nF
C27 "Capacitor" C0603 16.841,114.454 r0 top value=100nF
C28 "Capacitor" C0402 29.716,113.404 r90 top value=100nF
C29 "Capacitor" C0402 25.241,113.404 r90 top value=100nF
C30 "Capacitor" C0402 26.491,113.404 r90 top value=100nF
C31 "Capacitor" C0402 30.616,113.404 r90 top value=100nF
C32 "Capacitor" C0402 31.866,113.404 r90 top value=100nF
C33 "Capacitor" C0402 34.166,113.404 r90 top value=100nF
C34 "Capacitor" C0402 35.416,113.404 r90 top value=100nF
C35 "Capacitor" C0603 22.566,113.079 r90 top value=4.7uF
C36 "Capacitor" C0603 24.016,113.079 r90 top value=1uF
C37 "Capacitor" C0402 27.241,110.529 r270 top value=100nF
C38 "Capacitor" C0402 62.266,110.404 r180 top value=100nF
C39 "Capacitor" C0603 56.866,108.779 r270 top value=4.7uF
C40 "Capacitor" C0603 61.816,108.779 r270 top value=4.7uF
C41 "Capacitor" C0805 15.691,104.074 r0 top value=10uF
C42 "Capacitor" C0805 15.691,101.774 r0 top value=10uF
C43 "Capacitor" C0603 21.25,97.5 r0 top value=4.7uF
C44 "Capacitor" C0603 18.075,95.425 r90 top value=100nF
C45 "Capacitor" C0603 22.375,92.325 r0 top value=4.7uF
C46 "Capacitor" C0402 38.35,84.775 r270 top value=100nF
C47 "Capacitor" C0402 24.8,84.675 r270 top value=100nF
C48 "Capacitor" C0603 26.525,84.675 r0 top value=2.2uF
C49 "Capacitor" C0402 48.6,81 r180 top value=100nF
C50 "Capacitor" C0603 48.925,79.875 r180 top value=2.2uF
C51 "Capacitor" C0402 48.6,74.925 r180 top value=100nF
C52 "Capacitor" C0402 21.625,69.975 r0 top value=100nF
C53 "Capacitor" C0402 48.6,69.65 r180 top value=100nF
C54 "Capacitor" C0402 21.625,69.05 r0 top value=100nF
C55 "Capacitor" C0402 48.2,62.575 r90 top value=100nF
C56 "Capacitor" C0402 21.8,62.475 r0 top value=100nF
C57 "Capacitor" C0402 33.425,58.225 r0 top value=100nF
C58 "Capacitor" C0402 42.85,58.225 r0 top value=100nF
C59 "Capacitor" C0603 39.975,57.5 r90 top value=100nF
C60 "Capacitor" C0603 41.325,57.5 r90 top value=4.7uF
C61 "Capacitor" C0603 26.525,56.325 r90 top value=1uF
C62 "Capacitor" C0402 47.525,56.625 r270 top value=100nF
C63 "Capacitor" C0402 48.425,56.625 r270 top value=100nF
C64 "Capacitor" C0603 42.8,56.3 r270 top value=1uF
C65 "Capacitor" C0603 44.15,56.3 r90 top value=100nF
C66 "Capacitor" C0603 46.4,56.3 r270 top value=1uF
C67 "Capacitor" C0402 45.275,56.05 r90 top value=100nF
C68 "Capacitor" C0603 41.325,54.725 r90 top value=100nF
C69 "Capacitor" C0402 39.15,54.5 r270 top value=5.6pF
C70 "Capacitor" C0402 35.55,54.35 r90 top value=5.6pF
C71 "Capacitor" C0402 28.825,53.35 r180 top value=5.1pF
C72 "Capacitor" C0402 31.025,53.35 r0 top value=5.1pF
C73 "Capacitor" C0603 37.091,43.179 r270 top value=100nF
C74 "Capacitor" C0402 41.291,41.529 r180 top value=1uF
C75 "Capacitor" C0402 43.591,41.179 r180 top value=5.6pF
C76 "Capacitor" C0402 41.291,40.604 r180 top value=470pF
C77 "Capacitor" C0402 45.266,39.154 r270 top value=5.6pF
C78 "Capacitor" C0603 41.541,36.079 r180 top value=100nF
C79 "Capacitor" C0603 33.766,35.479 r180 top value=100nF
C80 "Capacitor" C0603 32.941,33.179 r90 top value=100nF
C81 "Capacitor" C0603 34.291,33.179 r90 top value=10uF
C82 "Capacitor" C0603 47.429,29.009 r180 top value=100nF
C83 "Capacitor" C0603 33.975,28.1 r90 top value=100nF
C84 "Capacitor" C0603 26.641,7.879 r90 top value=4.7uF
C85 "Capacitor" C1206_H1P6 34.25,6.525 r90 top value=1nF
CART1 "Comment" Sheetbox_6L2S -4.85,-28.5 r0 top
CN1 "USB_uB_105017.0001" CON_USBMICROB_MOLEX_105017-0001_H2P90 48.966,133.308 r180 top locked value=USB_uB_105017-0001
CN2 "Header 4x1" CON_SAMTEC_TSW-104-07-G-S 21.026,130.809 r0 top
CN3 "Jumper_Header 2x1" CON_SAMTEC_TSW-102-09-X-S 3.246,128.269 r270 bottom locked value="Header 2x1 16mm"
CN4 "Jumper_Header 2x1" CON_SAMTEC_TSW-102-09-X-S 66.746,128.269 r270 bottom locked value="Header 2x1 16mm"
CN5 "Header 7x2" CON_STDC14_Receiver_MEDIUM_WITH_MIPI10_3D 6.421,118.744 r270 top value="MIPI10 on STDC14 footprint"
CN7 "Socket 10x2_N144_ARD" CON_SAMTEC_SSW-110-23-X-D_N144_ARD 57.856,89.153 r90 top locked
CN8 "Socket 8x2_N144_ARD" CON_SAMTEC_SSW-108-23-X-D_N144_ARD 12.136,82.549 r90 top locked
CN9 "Socket 15x2_N144_ARD" CON_SAMTEC_SSW-115-23-X-D_N144_ARD 12.136,50.799 r90 top locked
CN10 "Socket 17x2_N144_ARD" CON_SAMTEC_SSW-117-23-X-D_N144_ARD 57.856,53.339 r90 top locked
CN11 "Header 35x2" CON_SAMTEC_TSW-135-07-X-D 4.516,58.419 r270 top locked
CN12 "Header 35x2" CON_SAMTEC_TSW-135-07-X-D 65.476,58.394 r270 top locked
CN13 "USB_uAB_47590.0001" CON_USBMICROAB_MOLEX_47590-0001_H3 20.823,0.014 r0 top locked value="USB uAB ZX62RD-AB-5P8(30)"
CN14 "RJ45_KRJ-CB4.2GYZNL" CON_RJ45_DGKYD_KRJ-CB4.2GYZNL 44.369,0 r0 top locked value=KRJ-CB4.2GYZNL
CN15 "Jumper_Header 2x1" CON_SAMTEC_TSW-102-09-X-S 65.476,12.674 r0 bottom locked value="Header 2x1 16mm"
CN16 "Jumper_Header 2x1" CON_SAMTEC_TSW-102-09-X-S 4.516,12.699 r0 bottom locked value="Header 2x1 16mm"
D1 "BAT60JFILM" DIO_SOD323 53.411,119.379 r180 bottom
D2 "BAT60JFILM" DIO_SOD323 53.411,116.839 r180 bottom
D3 "BAT60JFILM" DIO_SOD323 53.411,114.299 r180 bottom
JP1 "Jumper_Header 2x1" CON_SAMTEC_TSW-102-07-G-S 31.186,130.809 r180 top value="Shunt not fitted"
JP2 "Jumper_Header 4x2 Fitted 1-2" CON_SAMTEC_TSW-104-07-X-D 60.396,118.109 r270 top value="Shunt Fitted 1-2"
JP3 "Jumper_Header 2x1 Fitted" CON_SAMTEC_TSW-102-07-G-S 10.866,100.329 r270 top value="Shunt Fitted"
JP4 "Jumper_Header 2x1 Fitted" CON_SAMTEC_TSW-102-07-G-S 33.726,93.979 r180 top locked value="Shunt Fitted"
JP5 "Jumper_Header 3x1 Fitted 1-2" CON_SAMTEC_TSW-103-07-F-S 34.996,97.154 r180 top locked value="Shunt Fitted 1-2"
JP6 "Jumper_Header 2x1 Fitted" CON_SAMTEC_TSW-102-07-G-S 45.156,92.074 r180 top value="Shunt Fitted"
L1 "BEAD" L0603 30.766,33.854 r180 top value=600R@100MHz
LD1 "LED_green" LED_0603_OSRAM_LG-Q396-PS-35_GREEN_1A2K_H0P4 40.141,106.497 r90 top locked value=GREEN
LD2 "LED_yellow" LED_0603_OSRAM_LY-Q396-P1Q2-36_YELLOW_1A2K_H0P4 36.616,106.497 r90 top value=YELLOW
LD3 "LED_red" LED_0603_OSRAM_LS-Q976-NR-1_RED_1A2K_H0P8 33.208,106.497 r90 top value=RED
LD4 "LD_BICOLOR_CMS" LED_BI-GR_HSMF-A201-A00J1 57.316,129.529 r180 top
LD5 "LED_green" LED_0603_OSRAM_LG-Q396-PS-35_GREEN_1A2K_H0P4 66.746,121.119 r90 top value=GREEN
LD6 "LED_red" LED_0603_RED 62.091,130.679 r90 top value=RED
LD7 "LED_red" LED_0603_VISHAY_VLMS1300-GS08_RED_1A2K_H0P8 27.866,2.729 r90 top value=RED
LD8 "LED_green" LED_0603_OSRAM_LG-Q396-PS-35_GREEN_1A2K_H0P4 32.241,2.729 r90 top value=GREEN
MIRE-1 "Comment" MIRE_PLACE_SMD_0P8MM 6.416,129.929 r0 top
MIRE-2 "Comment" MIRE_PLACE_SMD_0P8MM 64.091,124.029 r0 top
MIRE-3 "Comment" MIRE_PLACE_SMD_0P8MM 60.716,11.154 r0 top
MIRE-4 "Comment" MIRE_PLACE_SMD_0P8MM 63.891,130.654 r180 bottom
MIRE-5 "Comment" MIRE_PLACE_SMD_0P8MM 5.841,128.029 r180 bottom
MIRE-6 "Comment" MIRE_PLACE_SMD_0P8MM 65.016,2.029 r180 bottom
Q1 "9013-SOT23" NPN_SOT23 40.141,106.147 r180 bottom value=SOT23
Q2 "9013-SOT23" NPN_SOT23 36.616,106.147 r180 bottom value=SOT23
Q3 "9013-SOT23" NPN_SOT23 33.208,106.147 r180 bottom value=SOT23
R1 "Resistor" R0603 37.325,130.029 r270 top value=100K
R2 "Resistor" R0603 62.091,127.979 r270 top value=1K
R3 "Resistor" R0402 9.041,126.954 r0 top value=22R
R4 "Resistor" R0603 11.066,126.779 r180 top value=100K
R5 "Resistor" R0402 25.466,126.429 r90 top value=100R
R6 "Resistor" R0402 29.016,126.429 r270 top value=3K
R7 "Resistor" R0603 39.673,126.459 r0 top value=10K
R8 "Resistor" R0603 56.566,125.877 r270 top value=330R
R9 "Resistor" R0603 58.116,125.852 r270 top value=330R
R10 "Resistor" R0402 11.316,121.279 r0 top value=22R
R11 "Resistor" R0402 11.316,120.004 r180 top value=22R
R12 "Resistor" R0603 66.746,118.619 r270 top value=620R
R13 "Resistor" R0402 11.316,118.729 r0 top value=22R
R14 "Resistor" R0402 37.891,117.979 r270 top value=4K7
R15 "Resistor" R0402 38.941,117.979 r270 top value=2K7
R17 "Resistor" R0402 1.941,116.654 r270 top value=100R
R18 "Resistor" R0402 35.591,116.279 r0 top value=4K7
R20 "Resistor" R0402 35.591,115.229 r0 top value=4K7
R21 "Resistor" R0402 28.416,113.404 r90 top value=100R
R22 "Resistor" R0402 33.191,113.404 r90 top value=10K
R23 "Resistor" R0402 11.316,112.304 r180 top value=22R
R24 "Resistor" R0402 30.916,110.529 r270 top value=10K
R25 "Resistor" R0402 63.016,108.529 r270 top value=10K
R26 "Resistor" R0402 40.141,104.179 r270 top value=270R
R27 "Resistor" R0402 33.216,103.879 r270 top value=270R
R28 "Resistor" R0402 36.616,103.879 r270 top value=470R
R29 "Resistor" R0402 12.991,102.054 r270 top value=22R
R30 "Resistor" R0402 20.666,98.704 r0 top value=10K
R31 "Resistor" R0402 23.1,94.45 r270 top value=27K
R32 "Resistor" R0402 24.15,94.45 r90 top value=56K
R33 "Resistor" R0603 20.725,67.225 r180 top value=10K
R34 "Resistor" R0603 20.175,63.85 r180 top value=10K
R35 "Resistor" R0603 20.175,65.25 r180 top value=10K
R36 "Resistor" R0603 44.875,58.175 r180 top value=0R
R37 "Resistor" R0603 47.225,58.175 r180 top value=0R
R38 "Resistor" R0603 29.225,57.175 r270 top value=0R
R39 "Resistor" R0603 30.625,57.175 r270 top value=0R
R40 "Resistor" R0402 32.466,42.854 r90 top value=10K
R41 "Resistor" R0402 33.516,42.854 r270 top value=33R
R42 "Resistor" R0402 35.566,42.854 r90 top value=10K
R43 "Resistor" R0402 38.291,42.854 r90 top value=10K
R44 "Resistor" R0402 39.341,42.854 r270 top value=33R
R45 "Resistor" R0402 40.391,42.854 r270 top value=33R
R46 "Resistor" R0402 41.441,42.854 r90 top value=10K
R47 "Resistor" R0402 33.191,41.479 r180 top value=1K5
R48 "Resistor" R0402 33.191,40.429 r180 top value=10K
R49 "Resistor" R0402 33.191,39.379 r0 top value=33R
R50 "Resistor" R0402 41.566,38.879 r180 top value=0R
R51 "Resistor" R0402 41.216,34.879 r0 top value=12K1
R52 "Resistor" R0402 34.191,19.404 r90 top value=75R
R53 "Resistor" R0402 48.516,19.404 r90 top value=75R
R54 "Resistor" R0402 32.091,18.504 r270 top value=75R
R55 "Resistor" R0402 33.141,18.504 r270 top value=75R
R56 "Resistor" R0402 31.066,13.679 r270 top value=47K
R57 "Resistor" R0402 34.841,12.973 r90 top value=10K
R58 "Resistor" R0402 53.866,11.129 r90 top value=270R
R59 "Resistor" R0402 34.866,11.079 r270 top value=270R
R60 "Resistor" R0402 26.266,10.979 r90 top value=10K
R61 "Resistor" R0402 31.391,11.024 r180 top value=47K
R62 "Resistor" R0402 28.141,9.454 r0 top value=47K
R63 "Resistor" R0402 29.941,9.454 r180 top value=10K
R64 "Resistor" R0603 14.566,5.729 r270 top value=100K
R65 "Resistor" R0402 29.091,2.429 r90 top value=360R
R66 "Resistor" R0402 33.466,2.429 r90 top value=270R
R67 "Resistor" R0402 15.866,115.454 r0 bottom value=100R
R68 "Resistor" R0603 40.411,103.385 r0 bottom value=100K
R69 "Resistor" R0603 36.866,103.379 r0 bottom value=100K
R70 "Resistor" R0603 33.466,103.379 r0 bottom value=100K
R71 "Resistor" R0603 36.866,101.979 r0 bottom value=47K
R72 "Resistor" R0603 33.466,101.979 r0 bottom value=47K
R73 "Resistor" R0603 40.414,101.967 r0 bottom value=47K
R74 "Resistor" R0603 26.825,56.325 r270 bottom value=330R
R75 "Resistor" R0402 39.191,34.379 r270 bottom value=49.9R
R76 "Resistor" R0402 38.191,34.379 r270 bottom value=49.9R
R77 "Resistor" R0402 37.191,34.379 r270 bottom value=49.9R
R78 "Resistor" R0402 36.191,34.379 r270 bottom value=49.9R
SB1 "SB_ON" SOLDER-BRIDGE_R0603-0R 10.6,129.1 r90 bottom
SB2 "SB_ON" SOLDER-BRIDGE_R0603-0R 54.491,108.079 r180 top
SB3 "SB_ON" SOLDER-BRIDGE_R0603-0R 36.65,56.975 r270 top
SB4 "SB_ON" SOLDER-BRIDGE_R0603-0R 38.05,56.975 r270 top
SB5 "SB_ON" SOLDER-BRIDGE_R0603-0R 15.891,116.679 r180 bottom
SB6 "SB_ON" SOLDER-BRIDGE_R0603-0R 25.441,95.879 r180 bottom
SB7 "SB_ON" SOLDER-BRIDGE_R0603-0R 46.45,94.7 r90 bottom
SB8 "SB_ON" SOLDER-BRIDGE_R0603-0R 49.275,87.75 r90 bottom
SB9 "SB_ON" SOLDER-BRIDGE_R0603-0R 47.875,87.75 r90 bottom
SB11 "SB_ON" SOLDER-BRIDGE_R0603-0R 17.925,86.875 r180 bottom
SB12 "SB_ON" SOLDER-BRIDGE_R0603-0R 45.475,84.95 r90 bottom
SB13 "SB_ON" SOLDER-BRIDGE_R0603-0R 36.525,84.95 r270 bottom
SB14 "SB_ON" SOLDER-BRIDGE_R0603-0R 34.375,84.95 r270 bottom
SB15 "SB_ON" SOLDER-BRIDGE_R0603-0R 32.05,84.95 r90 bottom
SB16 "SB_ON" SOLDER-BRIDGE_R0603-0R 29.275,84.95 r270 bottom
SB17 "SB_ON" SOLDER-BRIDGE_R0603-0R 27.75,84.95 r270 bottom
SB18 "SB_ON" SOLDER-BRIDGE_R0603-0R 49.275,84.95 r90 bottom
SB19 "SB_ON" SOLDER-BRIDGE_R0603-0R 47.875,84.95 r90 bottom
SB20 "SB_ON" SOLDER-BRIDGE_R0603-0R 17.925,85.375 r180 bottom
SB21 "SB_ON" SOLDER-BRIDGE_R0603-0R 29.266,81.729 r270 bottom
SB22 "SB_ON" SOLDER-BRIDGE_R0603-0R 27.766,81.729 r270 bottom
SB23 "SB_ON" SOLDER-BRIDGE_R0603-0R 32.3,77.575 r270 bottom
SB24 "SB_ON" SOLDER-BRIDGE_R0603-0R 30.9,77.575 r270 bottom
SB25 "SB_ON" SOLDER-BRIDGE_R0603-0R 26.25,77.575 r270 bottom
SB26 "SB_ON" SOLDER-BRIDGE_R0603-0R 31.775,74.325 r0 bottom
SB27 "SB_ON" SOLDER-BRIDGE_R0603-0R 20.4,74 r0 bottom
SB28 "SB_ON" SOLDER-BRIDGE_R0402-0R 51.125,72.944 r180 bottom
SB29 "SB_ON" SOLDER-BRIDGE_R0603-0R 31.775,72.675 r0 bottom
SB30 "SB_ON" SOLDER-BRIDGE_R0603-0R 20.4,72.6 r0 bottom
SB31 "SB_ON" SOLDER-BRIDGE_R0603-0R 31.775,71.275 r180 bottom
SB32 "SB_ON" SOLDER-BRIDGE_R0603-0R 20.4,71.2 r0 bottom
SB33 "SB_ON" SOLDER-BRIDGE_R0603-0R 31.775,69.875 r0 bottom
SB34 "SB_ON" SOLDER-BRIDGE_R0603-0R 20.4,69.075 r0 bottom
SB35 "SB_ON" SOLDER-BRIDGE_R0603-0R 30.775,68.475 r180 bottom
SB36 "SB_ON" SOLDER-BRIDGE_R0603-0R 46.05,66.475 r180 bottom
SB37 "SB_ON" SOLDER-BRIDGE_R0402-0R 51.125,70.175 r0 bottom
SB38 "SB_ON" SOLDER-BRIDGE_R0402-0R 51.125,68.4 r0 bottom
SB39 "SB_ON" SOLDER-BRIDGE_R0603-0R 45.9,65.075 r0 bottom
SB40 "SB_ON" SOLDER-BRIDGE_R0603-0R 30.375,64.1 r270 bottom
SB41 "SB_ON" SOLDER-BRIDGE_R0603-0R 28.975,64.1 r270 bottom
SB42 "SB_ON" SOLDER-BRIDGE_R0603-0R 41.95,63.9 r270 bottom
SB43 "SB_ON" SOLDER-BRIDGE_R0603-0R 40.55,63.9 r270 bottom
SB44 "SB_ON" SOLDER-BRIDGE_R0603-0R 37.15,63.9 r90 bottom
SB45 "SB_ON" SOLDER-BRIDGE_R0603-0R 35.75,63.9 r90 bottom
SB46 "SB_ON" SOLDER-BRIDGE_R0603-0R 34.35,63.9 r90 bottom
SB47 "SB_ON" SOLDER-BRIDGE_R0603-0R 45.725,63.675 r0 bottom
SB48 "SB_ON" SOLDER-BRIDGE_R0402-0R 51.125,66.175 r0 bottom
SB49 "SB_ON" SOLDER-BRIDGE_R0402-0R 51.125,64.575 r0 bottom
SB50 "SB_ON" SOLDER-BRIDGE_R0402-0R 51.125,62.675 r0 bottom
SB51 "SB_ON" SOLDER-BRIDGE_R0603-0R 27.925,59.825 r90 bottom
SB52 "SB_ON" SOLDER-BRIDGE_R0603-0R 26.525,59.825 r90 bottom
SB53 "SB_ON" SOLDER-BRIDGE_R0402-0R 18.4,60.95 r0 bottom
SB54 "SB_ON" SOLDER-BRIDGE_R0402-0R 51.125,61.575 r0 bottom
SB55 "SB_ON" SOLDER-BRIDGE_R0402-0R 18.4,62.05 r0 bottom
SB56 "SB_ON" SOLDER-BRIDGE_R0603-0R 46.025,58 r270 bottom
SB57 "SB_ON" SOLDER-BRIDGE_R0603-0R 44.425,58 r270 bottom
SB58 "SB_ON" SOLDER-BRIDGE_R0603-0R 42.875,58 r90 bottom
SB59 "SB_ON" SOLDER-BRIDGE_R0402-0R 51.125,59.775 r180 bottom
SB60 "SB_ON" SOLDER-BRIDGE_R0402-0R 18.4,56 r180 bottom
SB61 "SB_ON" SOLDER-BRIDGE_R0402-0R 51.125,58.7 r180 bottom
SB62 "SB_ON" SOLDER-BRIDGE_R0402-0R 18.4,59.35 r180 bottom
SB63 "SB_ON" SOLDER-BRIDGE_R0402-0R 51.125,56.375 r0 bottom
SB64 "SB_ON" SOLDER-BRIDGE_R0603-0R 41.225,54.5 r90 bottom
SB65 "SB_ON" SOLDER-BRIDGE_R0402-0R 18.4,57.625 r180 bottom
SB66 "SB_ON" SOLDER-BRIDGE_R0402-0R 51.125,54.175 r180 bottom
SB67 "SB_ON" SOLDER-BRIDGE_R0402-0R 18.4,54.9 r0 bottom
SB68 "SB_ON" SOLDER-BRIDGE_R0402-0R 51.125,55.275 r0 bottom
SB69 "SB_ON" SOLDER-BRIDGE_R0402-0R 18.4,53.3 r180 bottom
SB70 "SB_ON" SOLDER-BRIDGE_R0402-0R 18.4,51.7 r180 bottom
SB71 "SB_ON" SOLDER-BRIDGE_R0402-0R 18.4,46.625 r0 bottom
SB72 "SB_ON" SOLDER-BRIDGE_R0603-0R 45.156,45.156 r180 bottom locked
SB73 "SB_ON" SOLDER-BRIDGE_R0402-0R 51.125,40.675 r180 bottom
SB74 "SB_ON" SOLDER-BRIDGE_R0603-0R 32.691,38.879 r0 bottom
SB75 "SB_ON" SOLDER-BRIDGE_R0402-0R 51.125,38.1 r0 bottom
SB76 "SB_ON" SOLDER-BRIDGE_R0603-0R 59.55,18.35 r270 bottom
SB77 "SB_ON" SOLDER-BRIDGE_R0603-0R 28.646,17.144 r270 bottom locked
SB78 "SB_ON" SOLDER-BRIDGE_R0603-0R 54.825,6.35 r0 bottom
SB79 "SB_ON" SOLDER-BRIDGE_R0603-0R 34.05,6.35 r180 bottom
SB80 "SB_ON" SOLDER-BRIDGE_R0603-0R 26.55,91.85 r0 top
SB81 "SB_ON" SOLDER-BRIDGE_R0402-0R 11.45,14.125 r180 bottom
SB82 "SB_ON" SOLDER-BRIDGE_R0402-0R 51.5,92.375 r180 bottom
T1 "9013-SOT23" NPN_SOT23 29.391,6.954 r270 top value=SOT23
TP1 "Test Point" TP_SMD_1MM 53.891,109.754 r270 top
TP2 "Test Point" TP_SMD_1MM 26.041,94.004 r180 top
TP3 "Test Point" TP_SMD_1MM 17.825,92.909 r270 top
TP4 "Test Point" TP_SMD_1MM 31.825,84.65 r0 top
U1 "SN74LVC2T45DCUT" ICC_VSSOP8_DCU_R-PDSO-G8_2X2P30_P050 9.866,129.729 r180 top
U2 "STMPS2151STR" MOS_SOT23-5L 39.916,129.114 r180 top
U3 "ESD-TRANSIL" ESD_ST0201 21.541,128.679 r0 top value=ESDALC6V1-1U2
U4 "ESD-TRANSIL" ESD_ST0201 22.991,128.679 r180 top value=ESDALC6V1-1U2
U5 "ECMF02-2AMX6" ESD_QFN-6L_1P7X1P5_P050 49.541,126.504 r0 top
U6 "ESD-TRANSIL" ESD_QFN2_1P6X1_P125 52.024,126.293 r0 top value=ESDA7P60-1U1M
U7 "ST-LINKV3E_SWD" ICC_UFBGA201_176+25_10X10_P065 29.066,119.904 r90 top
U8 "ESDALC6V1W5" ESD_SOT323-5L 14.616,120.654 r270 top
U9 "LD3985M33R" REG_SOT23-5L 45.291,117.829 r90 top
U10 "SN74LVC2T45DCUT" ICC_VSSOP8_DCU_R-PDSO-G8_2X2P30_P050 15.866,116.429 r90 top
U11 "ST1L05CPU33R" ICC_DFN6-EPAD_3X3_P095 59.348,109.376 r180 top value="ST1L05CPU33R 3.3V 1.3A"
U12 "LD1117S50TR" REG_SOT223-TAB 21.441,104.054 r270 top
U13 "ST1L05BPUR" ICC_DFN6-EPAD_3X3_P095 20.666,94.929 r270 top
U14 "STM32H7A3ZIT6" ICC_LQFP144_20X20_P050_SOCKET_YAMAICHI_IC149-144-145-B5_NM 35.116,71.304 r90 top locked value=STM32H7A3ZIT6U
U15 "LAN8742A-CZ-TR" ICC_VQFN24-EPAD_4X4_P050 37.691,38.629 r180 top
U16 "USBLC6-4SC6" ESD_SOT23-6L 37.691,32.279 r180 top
U17 "KMS-1102NL" TRS_DGKYD_KMS-1102NL 41.346,22.859 r180 top
U18 "STMPS2141STR" MOS_SOT23-5L 28.691,12.124 r0 top
U19 "USBLC6-2SC6" ESD_SOT23-6L 21.166,8.279 r180 top locked
U20 "ESD-TRANSIL" ESD_ST0201 55.748,8.523 r270 top value=ESDALC6V1-1U2
U21 "ESD-TRANSIL" ESD_QFN2_1P6X1_P125 24.866,6.129 r0 top value=ESDA7P60-1U1M
U22 "ESD-TRANSIL" ESD_ST0201 18.616,5.879 r180 top value=ESDALC6V1-1U2
U23 "ESD-TRANSIL" ESD_ST0201 14.566,3.704 r270 top value=ESDALC6V1-1U2
U24 "ESDALC6V1W5" ESD_SOT323-5L 8.991,115.354 r180 bottom
X1 "OSCILLATOR_4_PINS" OSC_NDK_NZ2520SB_4P 29.041,110.904 r90 top value="NZ2520SH 25MHz"
X2 "XTAL_2_PINS" CRY_NX3215SA_2P 29.925,54.9 r180 top value="NX3215SA 32.768KHz"
X3 "XTAL_4_PINS" CRY_NX2016SA_4P 37.35,54.425 r0 top value="NX2016SA 25MHz"
X4 "XTAL_4_PINS" CRY_NX2016SA_4P 43.666,39.379 r90 top value="NX2016SA 25MHz"

## Footprints (in the part's own frame and the unit in brackets; to place one, negate y for a bottom-side part, rotate by r counter-clockwise, add the part's x,y. Pads: shape width x height; smd on the part's side, far side on the other; paste and mask are expansions set on the pad)
C0402 [mm]
  rect 0.51x0.56 smd mask+0.05: 1(-0.45,0) 2(0.45,0)
  silkscreen extent 0,-0.3 0,0.3, body extent -0.5,-0.3 0.5,0.3, height 0.4
C0603 [mm]
  rect 0.64x0.89 smd mask+0.05: 1(-0.7,0) 2(0.7,0)
  silkscreen extent -0.9,-0.55 1.05,0.55, body extent -0.9,-0.5 0.9,0.5, height 1.4
C0805 [mm]
  rect 0.9x1.4 smd mask+0.05: 1(-0.85,0) 2(0.85,0)
  silkscreen extent -1.3,-0.77 1.3,0.77, body extent -1.1,-0.7 1.1,0.7, height 1.35
C1206_H1P6 [mm]
  rect 1.4x1.78 smd mask+0.05: 1(-1.4,0) 2(1.4,0)
  silkscreen extent -2.12,-0.97 2.15,0.97, body extent -1.7,-0.9 1.7,0.9, height 1.8
CON_RJ45_DGKYD_KRJ-CB4.2GYZNL [mm] "RJ45  connector, right angle"
  rect 1x1 hole 0.7 mask+0.05: 1(3.57,10.6)
  round 1 hole 0.7 mask+0.05: 2(2.55,11.7) 3(1.53,10.6) 4(0.51,11.7) 5(-0.51,10.6) 6(-1.53,11.7) 7(-2.55,10.6) 8(-3.57,11.7) 9(7.06,9.52) 10(4.77,9.52) 11(-4.77,9.52) 12(-7.06,9.52)
  oval 1.3x2.8 hole 0.7 slot 2.2 at 90 deg mask+0.05: SH1(8.04,4.2) SH2(-8.04,4.2)
  Multi-Layer keep-out lines w0.1: -9,0 -7,0 -7,6.4 cw(c-7,7.3) -7,8.2 7,8.2 cw(c7,7.3) 7,6.4 7,0 9,0
  silkscreen extent -8.23,-4.1 8.22,11.45, body extent -8.39,-4.1 8.39,11.9, height 6.85
CON_SAMTEC_SSW-108-23-X-D_N144_ARD [mm] "NUCLEO144_ARDUINO CONNECTOR"
  rect 1.85x1.85 / inner round 1.85 / far side rect 1.85x1.85 hole 1.1 mask+0.05: 1(8.89,1.27)
  round 1.85 hole 1.1 mask+0.05: 2(8.89,-1.27) 3(6.35,1.27) 4(6.35,-1.27) 5(3.81,1.27) 6(3.81,-1.27) 7(1.27,1.27) 8(1.27,-1.27) 9(-1.27,1.27) 10(-1.27,-1.27) 11(-3.81,1.27) 12(-3.81,-1.27) 13(-6.35,1.27) 14(-6.35,-1.27) 15(-8.89,1.27) 16(-8.89,-1.27)
  silkscreen extent -10.42,-2.47 10.42,2.47, body extent -10.42,-2.48 10.42,2.48, height 8.51
CON_SAMTEC_SSW-110-23-X-D_N144_ARD [mm] "NUCLEO144_ARDUINO CONNECTOR"
  rect 1.85x1.85 / inner round 1.85 / far side rect 1.85x1.85 hole 1.1 mask+0.05: 1(11.43,1.27)
  round 1.85 hole 1.1 mask+0.05: 2(11.43,-1.27) 3(8.89,1.27) 4(8.89,-1.27) 5(6.35,1.27) 6(6.35,-1.27) 7(3.81,1.27) 8(3.81,-1.27) 9(1.27,1.27) 10(1.27,-1.27) 11(-1.27,1.27) 12(-1.27,-1.27) 13(-3.81,1.27) 14(-3.81,-1.27) 15(-6.35,1.27) 16(-6.35,-1.27) 17(-8.89,1.27) 18(-8.89,-1.27) 19(-11.43,1.27) 20(-11.43,-1.27)
  silkscreen extent -12.96,-2.47 12.96,2.47, body extent -12.96,-2.48 12.96,2.48, height 8.51
CON_SAMTEC_SSW-115-23-X-D_N144_ARD [mm] "NUCLEO144_ARDUINO CONNECTOR"
  rect 1.85x1.85 / inner round 1.85 / far side rect 1.85x1.85 hole 1.1 mask+0.05: 1(17.78,1.27)
  round 1.85 hole 1.1 mask+0.05: 2(17.78,-1.27) 3(15.24,1.27) 4(15.24,-1.27) 5(12.7,1.27) 6(12.7,-1.27) 7(10.16,1.27) 8(10.16,-1.27) 9(7.62,1.27) 10(7.62,-1.27) 11(5.08,1.27) 12(5.08,-1.27) 13(2.54,1.27) 14(2.54,-1.27) 15(0,1.27) 16(0,-1.27) 17(-2.54,1.27) 18(-2.54,-1.27) 19(-5.08,1.27) 20(-5.08,-1.27) 21(-7.62,1.27) 22(-7.62,-1.27) 23(-10.16,1.27) 24(-10.16,-1.27) 25(-12.7,1.27) 26(-12.7,-1.27) 27(-15.24,1.27) 28(-15.24,-1.27) 29(-17.78,1.27) 30(-17.78,-1.27)
  silkscreen extent -19.31,-2.47 19.31,2.47, body extent -19.31,-2.48 19.31,2.48, height 8.51
CON_SAMTEC_SSW-117-23-X-D_N144_ARD [mm] "NUCLEO144_ARDUINO CONNECTOR"
  rect 1.85x1.85 / inner round 1.85 / far side rect 1.85x1.85 hole 1.1 mask+0.05: 1(20.32,1.27)
  round 1.85 hole 1.1 mask+0.05: 2(20.32,-1.27) 3(17.78,1.27) 4(17.78,-1.27) 5(15.24,1.27) 6(15.24,-1.27) 7(12.7,1.27) 8(12.7,-1.27) 9(10.16,1.27) 10(10.16,-1.27) 11(7.62,1.27) 12(7.62,-1.27) 13(5.08,1.27) 14(5.08,-1.27) 15(2.54,1.27) 16(2.54,-1.27) 17(0,1.27) 18(0,-1.27) 19(-2.54,1.27) 20(-2.54,-1.27) 21(-5.08,1.27) 22(-5.08,-1.27) 23(-7.62,1.27) 24(-7.62,-1.27) 25(-10.16,1.27) 26(-10.16,-1.27) 27(-12.7,1.27) 28(-12.7,-1.27) 29(-15.24,1.27) 30(-15.24,-1.27) 31(-17.78,1.27) 32(-17.78,-1.27) 33(-20.32,1.27) 34(-20.32,-1.27)
  silkscreen extent -21.85,-2.47 21.85,2.47, body extent -21.85,-2.48 21.85,2.48, height 8.51
CON_SAMTEC_TSW-102-07-G-S [mm]
  rect 1.85x1.85 / inner round 1.85 / far side rect 1.85x1.85 hole 1 mask+0.05: 1(-1.27,0)
  round 1.85 hole 1 mask+0.05: 2(1.27,0)
  silkscreen extent -2.58,-1.3 2.58,1.3, body extent -2.67,-1.3 2.58,1.3, height 8.38
CON_SAMTEC_TSW-102-09-X-S [mm]
  rect 1.85x1.85 / inner round 1.85 / far side rect 1.85x1.85 hole 1 mask+0.05: 1(-1.27,0)
  round 1.85 hole 1 mask+0.05: 2(1.27,0)
  silkscreen extent -2.64,-1.37 2.64,1.37, body extent -2.67,-1.3 2.58,1.3, height 8.38
CON_SAMTEC_TSW-103-07-F-S [mm]
  rect 1.85x1.85 / inner round 1.85 / far side rect 1.85x1.85 hole 1 mask+0.05: 1(-2.54,0)
  round 1.85 hole 1 mask+0.05: 2(0,0) 3(2.54,0)
  silkscreen extent -3.85,-1.3 3.85,1.3, body extent -3.91,-1.37 3.91,1.37, height 8.38
CON_SAMTEC_TSW-104-07-G-S [mm]
  rect 1.85x1.85 / inner round 1.85 / far side rect 1.85x1.85 hole 1 mask+0.05: 1(-3.81,0)
  round 1.85 hole 1 mask+0.05: 2(-1.27,0) 3(1.27,0) 4(3.81,0)
  silkscreen extent -5.12,-1.3 5.12,1.3, body extent -5.21,-1.37 5.18,1.37, height 8.38
CON_SAMTEC_TSW-104-07-X-D [mm]
  rect 1.85x1.85 / inner round 1.85 / far side rect 1.85x1.85 hole 1 mask+0.05: 1(-3.81,-1.27)
  round 1.85 hole 1 mask+0.05: 2(-3.81,1.27) 3(-1.27,-1.27) 4(-1.27,1.27) 5(1.27,-1.27) 6(1.27,1.27) 7(3.81,-1.27) 8(3.81,1.27)
  silkscreen extent -5.08,-2.54 5.08,2.54, body extent -5.08,-2.54 5.08,2.54, height 8.38
CON_SAMTEC_TSW-135-07-X-D [mm]
  rect 1.85x1.85 / inner round 1.85 / far side rect 1.85x1.85 hole 1 mask+0.05: 1(-43.18,-1.27)
  round 1.85 hole 1 mask+0.05: 2(-43.18,1.27) 3(-40.64,-1.27) 4(-40.64,1.27) 5(-38.1,-1.27) 6(-38.1,1.27) 7(-35.56,-1.27) 8(-35.56,1.27) 9(-33.02,-1.27) 10(-33.02,1.27) 11(-30.48,-1.27) 12(-30.48,1.27) 13(-27.94,-1.27) 14(-27.94,1.27) 15(-25.4,-1.27) 16(-25.4,1.27) 17(-22.86,-1.27) 18(-22.86,1.27) 19(-20.32,-1.27) 20(-20.32,1.27) 21(-17.78,-1.27) 22(-17.78,1.27) 23(-15.24,-1.27) 24(-15.24,1.27) 25(-12.7,-1.27) 26(-12.7,1.27) 27(-10.16,-1.27) 28(-10.16,1.27) 29(-7.62,-1.27) 30(-7.62,1.27) 31(-5.08,-1.27) 32(-5.08,1.27) 33(-2.54,-1.27) 34(-2.54,1.27) 35(0,-1.27) 36(0,1.27) 37(2.54,-1.27) 38(2.54,1.27) 39(5.08,-1.27) 40(5.08,1.27) 41(7.62,-1.27) 42(7.62,1.27) 43(10.16,-1.27) 44(10.16,1.27) 45(12.7,-1.27) 46(12.7,1.27) 47(15.24,-1.27) 48(15.24,1.27) 49(17.78,-1.27) 50(17.78,1.27) 51(20.32,-1.27) 52(20.32,1.27) 53(22.86,-1.27) 54(22.86,1.27) 55(25.4,-1.27) 56(25.4,1.27) 57(27.94,-1.27) 58(27.94,1.27) 59(30.48,-1.27) 60(30.48,1.27) 61(33.02,-1.27) 62(33.02,1.27) 63(35.56,-1.27) 64(35.56,1.27) 65(38.1,-1.27) 66(38.1,1.27) 67(40.64,-1.27) 68(40.64,1.27) 69(43.18,-1.27) 70(43.18,1.27)
  silkscreen extent -44.45,-2.54 44.45,2.54, body extent -44.45,-2.54 44.45,2.54, height 8.38
CON_STDC14_Receiver_MEDIUM_WITH_MIPI10_3D [mm] "compatible with FTSH-105-01-L-DV,-K and FTSH-107-01-L-DV,-K,-A,-P,-ES"
  round 0 hole 1.19 unplated mask+0.05: 0(-5.445,0) 0(5.445,0)
  round 0 hole 0.97 unplated mask+0.05: 0(-3.175,0) 0(3.175,0)
  rect 0.74x2.79 smd mask+0.05: 1(-3.81,-2.032) 2(-3.81,2.032) 3(-2.54,-2.032) 4(-2.54,2.032) 5(-1.27,-2.032) 6(-1.27,2.032) 7(0,-2.032) 8(0,2.032) 9(1.27,-2.032) 10(1.27,2.032) 11(2.54,-2.032) 12(2.54,2.032) 13(3.81,-2.032) 14(3.81,2.032)
  silkscreen extent -6.3,-4.38 6.3,3.6, body extent -6.3,-2.92 6.3,2.92, height 6.6
CON_USBMICROAB_MOLEX_47590-0001_H3 [mm]
  rect 0.4x1.35 smd mask+0.05: 1(1.3,4.125) 2(0.65,4.125) 3(0,4.125) 4(-0.65,4.125) 5(-1.3,4.125)
  oval 1.05x1.25 hole 0.65 slot 0.85 at 90 deg mask+0.05: 6(-2.225,4.45) 7(2.225,4.45)
  rrect50% 1.375x1.9 hole 0.6 slot 1.3 at 90 deg copper offset 0.188,0 mask+0.05: 8(-4.175,1.45)
  rrect50% 1.375x1.9 hole 0.6 slot 1.3 at 90 deg copper offset -0.188,0 mask+0.05: 9(4.175,1.45)
  rect 2.9x1.9 smd mask+0.05: 10(0,1.45)
  oval 0.85x2.425 hole 0.85 slot 2.425 at 90 deg unplated mask+0.1: 11(-2.375,0.8) 12(2.375,0.8)
  silkscreen extent -4.1,-1.3 4.1,4.3, body extent -4.32,-1.36 4.33,4.6, height 3
CON_USBMICROB_MOLEX_105017-0001_H2P90 [mm]
  rect 0.4x1.35 smd mask+0.05: 1(-1.3,4.15) 2(-0.65,4.15) 3(0,4.15) 4(0.65,4.15) 5(1.3,4.15)
  round 1.5 hole 0.9 mask+0.05: 6(-2.5,4.15) 7(2.5,4.15)
  oval 1.2x1.9 hole 0.6 slot 1.3 at 90 deg mask+0.05: 8(3.5,1.45) 9(-3.5,1.45)
  rect 1.5x1.9 smd mask+0.05: 10(-1,1.45) 11(1,1.45)
  Top Layer region: -3.5,2.4 -2.3,2.4 -2.3,0.5 -3.5,0.5 -3.5,2.4
  Top Layer region: 2.3,2.4 3.5,2.4 3.5,0.5 2.3,0.5 2.3,2.4
  silkscreen extent -4,-0.7 4,4.6, body extent -4.1,-1.15 4.1,4.66, height 2.9
CRY_NX2016SA_4P [mm]
  rect 0.85x0.75 smd mask+0.05: 1(-0.675,-0.525) 2(0.675,-0.525) 3(0.675,0.525) 4(-0.675,0.525)
  silkscreen extent -1.22,-1.02 1.05,0.85, body extent -1.05,-0.85 1.05,0.85, height 0.7
CRY_NX3215SA_2P [mm]
  rect 1x1.8 smd mask+0.05: 1(-1.25,0) 2(1.25,0)
  silkscreen extent -0.63,-0.8 0.63,0.8, body extent -1.65,-0.8 1.65,0.8, height 0.9
DIO_SOD323 [mm]
  rect 1.06x0.54 smd mask+0.05: 1(-1.07,0) 2(1.07,0)
  silkscreen extent -0.9,-0.72 0.9,0.72, body extent -1.3,-0.78 1.3,0.78, height 1.17
ESD_QFN2_1P6X1_P125 [mm]
  rect 0.55x0.8 smd mask+0.05: 1(-0.625,0) 2(0.625,0)
  silkscreen extent -1,-0.55 0.85,0.55, body extent -0.85,-0.55 0.85,0.55, height 0.61
ESD_QFN-6L_1P7X1P5_P050 [mm]
  rect 0.25x0.6 smd mask+0.05: 1(-0.5,-0.65) 2(0,-0.65) 3(0.5,-0.65) 4(0.5,0.65) 5(0,0.65) 6(-0.5,0.65)
  silkscreen extent -0.9,-0.8 0.9,0.8, body extent -0.9,-0.8 0.9,0.8, height 0.56
ESD_SOT23-6L [mm]
  rect 0.6x1.2 smd mask+0.05: 1(-0.95,-1.15) 2(0,-1.15) 3(0.95,-1.15) 4(0.95,1.15) 5(0,1.15) 6(-0.95,1.15)
  silkscreen extent -1.53,-0.87 1.53,0.87, body extent -1.52,-1.5 1.52,1.5, height 1.45
ESD_SOT323-5L [mm]
  rect 0.4x1.2 smd mask+0.05: 1(-0.65,-0.85) 2(0,-0.85) 3(0.65,-0.85) 4(0.65,0.85) 5(-0.65,0.85)
  silkscreen extent -1.22,-1.21 1.22,0.77, body extent -1.15,-1.05 1.15,1.05, height 1.1
ESD_ST0201 [mm]
  rect 0.425x0.33 smd mask+0.05: 1(-0.312,0) 2(0.312,0)
  silkscreen extent -0.55,-0.3 0.33,0.3, body extent -0.34,-0.18 0.34,0.18, height 0.34
ICC_DFN6-EPAD_3X3_P095 [mm]
  rect 0.45x0.5 smd mask+0.05: 1(-0.95,-1.3) 2(0,-1.3) 3(0.95,-1.3) 4(0.95,1.3) 5(0,1.3) 6(-0.95,1.3)
  rect 2.5x1.7 smd mask+0.05: EP(0,0)
  silkscreen extent -1.55,-1.55 1.55,1.55, body extent -1.55,-1.55 1.55,1.55, height 1
ICC_LQFP144_20X20_P050_SOCKET_YAMAICHI_IC149-144-145-B5_NM [mm]
  rect 1x2.5 smd rot 45 mask+0.05: 0(-10.96,-10.96) 0(10.96,10.96)
  rect 1x2.5 smd rot 135 mask+0.05: 0(-10.96,10.96) 0(10.96,-10.96)
  round 0 hole 1.5 unplated mask+0.05: 0(0,8) 0(0,-8)
  rect 1.65x0.5 smd mask+0.05: 1(-10.825,8.85) 36(-10.825,-8.85) 73(10.825,-8.85) 108(10.825,8.85)
  rect 1.65x0.3 smd mask+0.05: 2(-10.825,8.25) 3(-10.825,7.75) 4(-10.825,7.25) 5(-10.825,6.75) 6(-10.825,6.25) 7(-10.825,5.75) 8(-10.825,5.25) 9(-10.825,4.75) 10(-10.825,4.25) 11(-10.825,3.75) 12(-10.825,3.25) 13(-10.825,2.75) 14(-10.825,2.25) 15(-10.825,1.75) 16(-10.825,1.25) 17(-10.825,0.75) 18(-10.825,0.25) 19(-10.825,-0.25) 20(-10.825,-0.75) 21(-10.825,-1.25) 22(-10.825,-1.75) 23(-10.825,-2.25) 24(-10.825,-2.75) 25(-10.825,-3.25) 26(-10.825,-3.75) 27(-10.825,-4.25) 28(-10.825,-4.75) 29(-10.825,-5.25) 30(-10.825,-5.75) 31(-10.825,-6.25) 32(-10.825,-6.75) 33(-10.825,-7.25) 34(-10.825,-7.75) 35(-10.825,-8.25) 74(10.825,-8.25) 75(10.825,-7.75) 76(10.825,-7.25) 77(10.825,-6.75) 78(10.825,-6.25) 79(10.825,-5.75) 80(10.825,-5.25) 81(10.825,-4.75) 82(10.825,-4.25) 83(10.825,-3.75) 84(10.825,-3.25) 85(10.825,-2.75) 86(10.825,-2.25) 87(10.825,-1.75) 88(10.825,-1.25) 89(10.825,-0.75) 90(10.825,-0.25) 91(10.825,0.25) 92(10.825,0.75) 93(10.825,1.25) 94(10.825,1.75) 95(10.825,2.25) 96(10.825,2.75) 97(10.825,3.25) 98(10.825,3.75) 99(10.825,4.25) 100(10.825,4.75) 101(10.825,5.25) 102(10.825,5.75) 103(10.825,6.25) 104(10.825,6.75) 105(10.825,7.25) 106(10.825,7.75) 107(10.825,8.25)
  rect 0.5x1.65 smd mask+0.05: 37(-8.85,-10.825) 72(8.85,-10.825) 109(8.85,10.825) 144(-8.85,10.825)
  rect 0.3x1.65 smd mask+0.05: 38(-8.25,-10.825) 39(-7.75,-10.825) 40(-7.25,-10.825) 41(-6.75,-10.825) 42(-6.25,-10.825) 43(-5.75,-10.825) 44(-5.25,-10.825) 45(-4.75,-10.825) 46(-4.25,-10.825) 47(-3.75,-10.825) 48(-3.25,-10.825) 49(-2.75,-10.825) 50(-2.25,-10.825) 51(-1.75,-10.825) 52(-1.25,-10.825) 53(-0.75,-10.825) 54(-0.25,-10.825) 55(0.25,-10.825) 56(0.75,-10.825) 57(1.25,-10.825) 58(1.75,-10.825) 59(2.25,-10.825) 60(2.75,-10.825) 61(3.25,-10.825) 62(3.75,-10.825) 63(4.25,-10.825) 64(4.75,-10.825) 65(5.25,-10.825) 66(5.75,-10.825) 67(6.25,-10.825) 68(6.75,-10.825) 69(7.25,-10.825) 70(7.75,-10.825) 71(8.25,-10.825) 110(8.25,10.825) 111(7.75,10.825) 112(7.25,10.825) 113(6.75,10.825) 114(6.25,10.825) 115(5.75,10.825) 116(5.25,10.825) 117(4.75,10.825) 118(4.25,10.825) 119(3.75,10.825) 120(3.25,10.825) 121(2.75,10.825) 122(2.25,10.825) 123(1.75,10.825) 124(1.25,10.825) 125(0.75,10.825) 126(0.25,10.825) 127(-0.25,10.825) 128(-0.75,10.825) 129(-1.25,10.825) 130(-1.75,10.825) 131(-2.25,10.825) 132(-2.75,10.825) 133(-3.25,10.825) 134(-3.75,10.825) 135(-4.25,10.825) 136(-4.75,10.825) 137(-5.25,10.825) 138(-5.75,10.825) 139(-6.25,10.825) 140(-6.75,10.825) 141(-7.25,10.825) 142(-7.75,10.825) 143(-8.25,10.825)
  silkscreen extent -10.1,-10.1 10.1,10.1, body extent -11,-11 11,11, height 1.6